# Altium PCB Motherboard.PcbDoc (part 1 of 4)
Units mm, origin at the board's own origin, x right, y up, seen from the top; angles counter-clockwise.
Board outline 133.86 x 61.62 mm, 4 copper layers (Top Layer, Ground Plane, Power Plane, Bottom Layer), stack 1.586 mm thick; 226 components, 149 nets, 791 pads, 852 vias.
Unrouted connection lines stored in the file: 19.
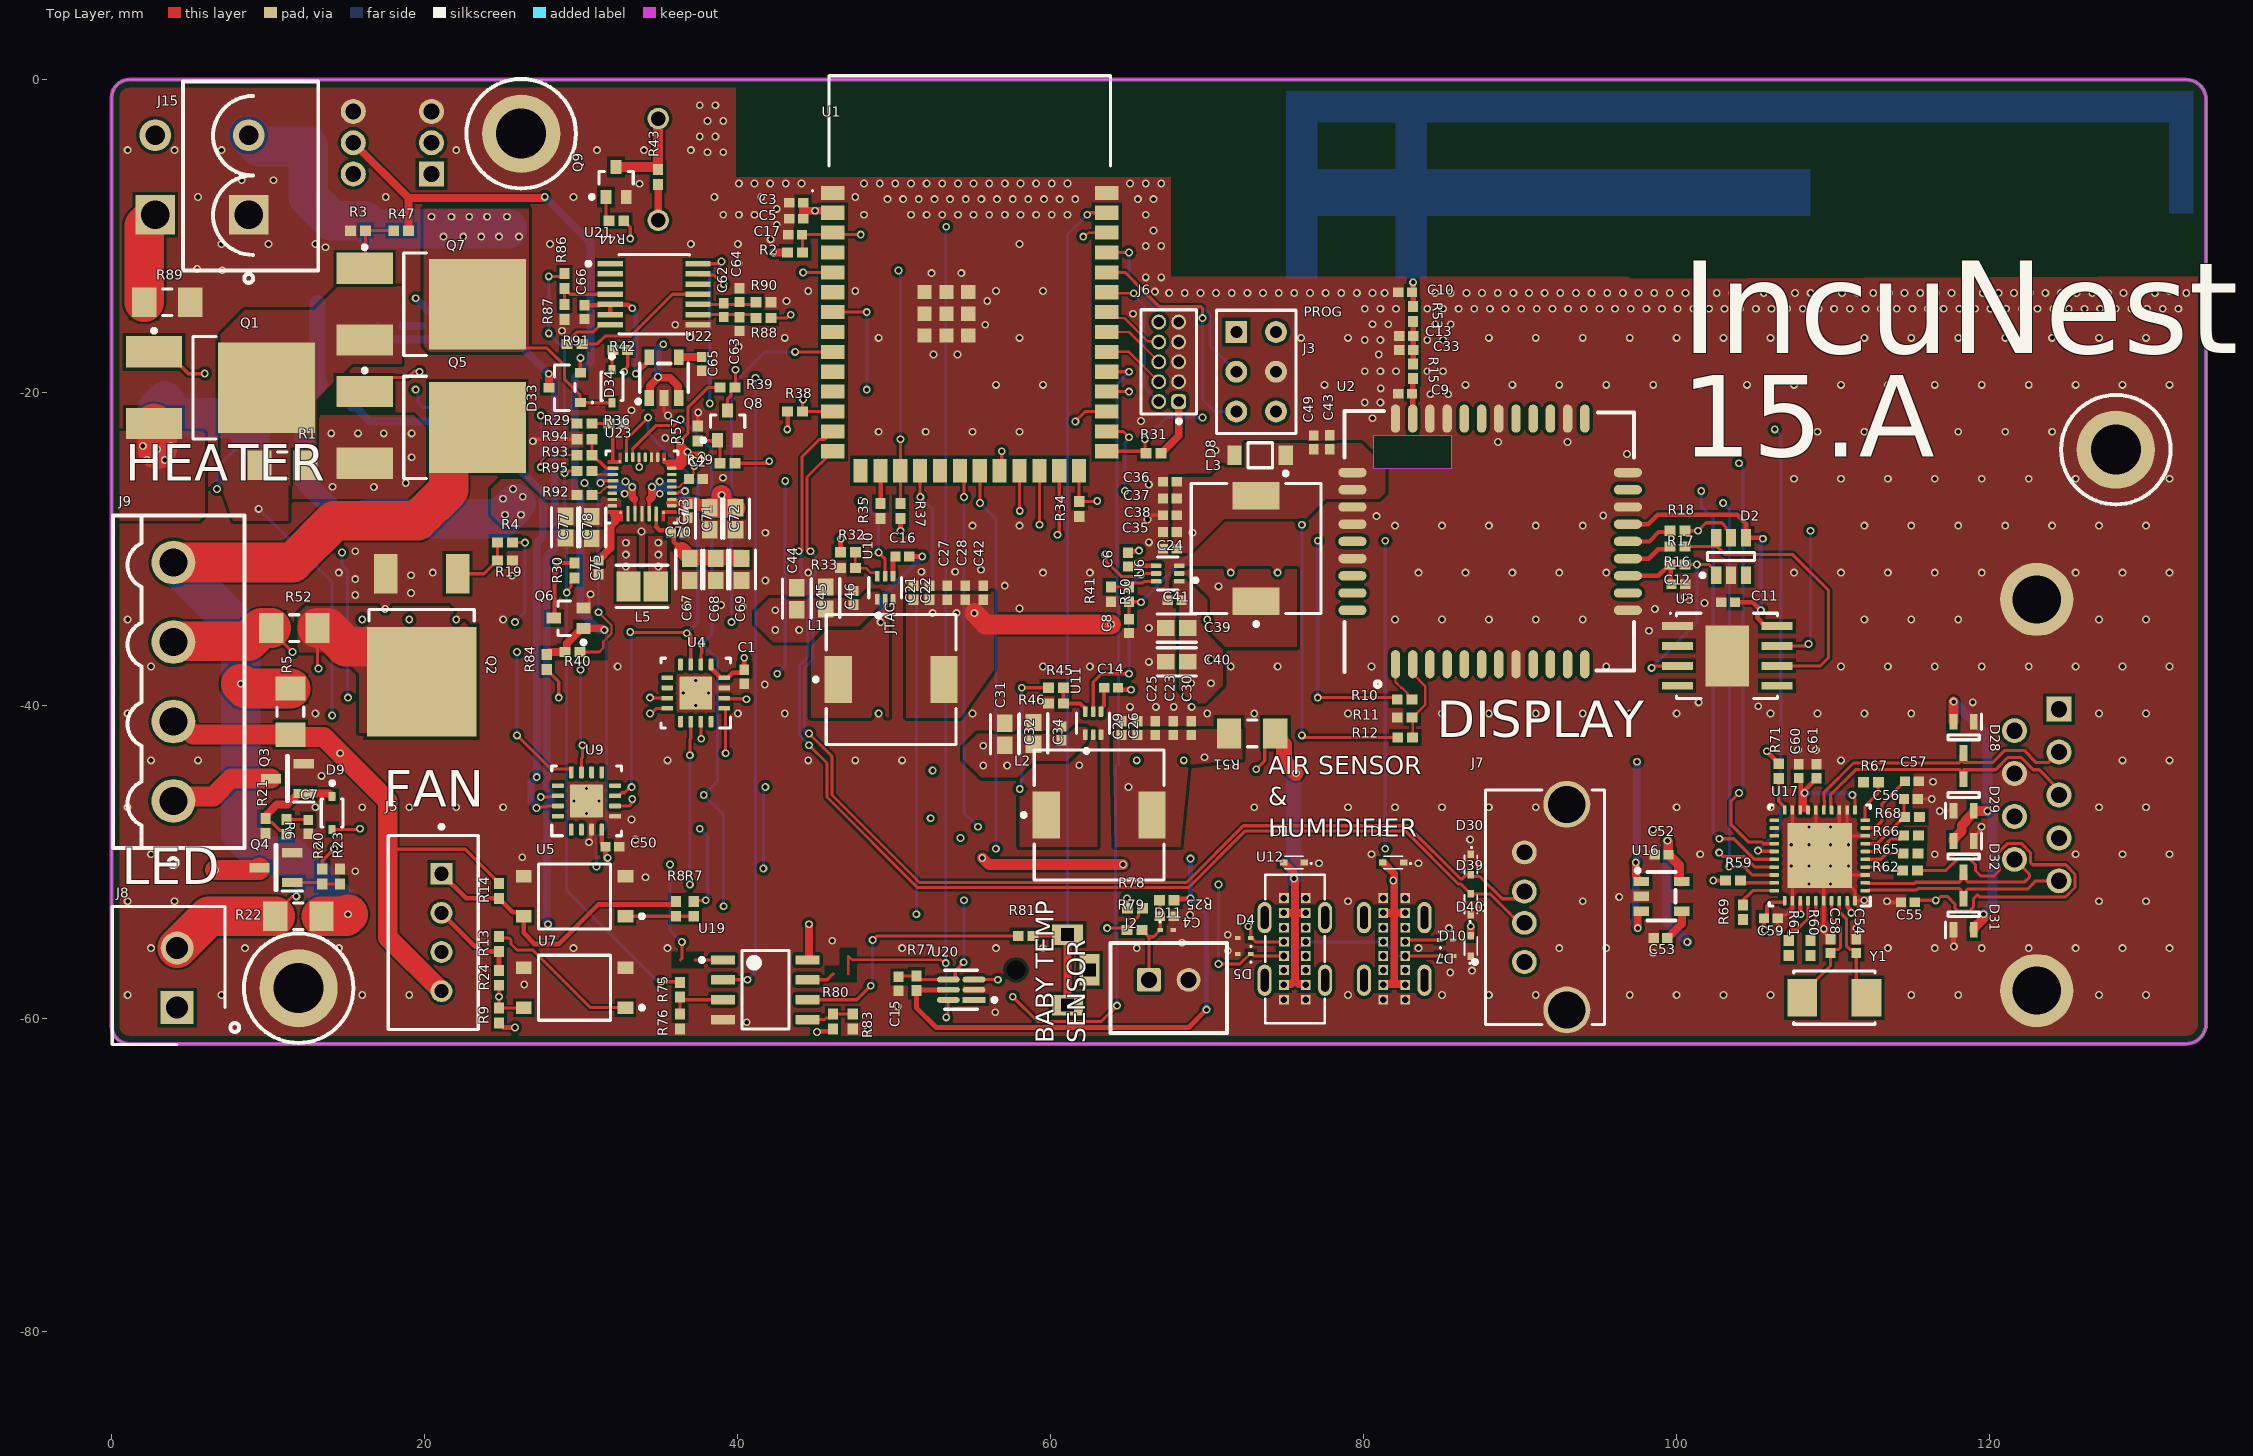
[diagram p0: Top Layer view]
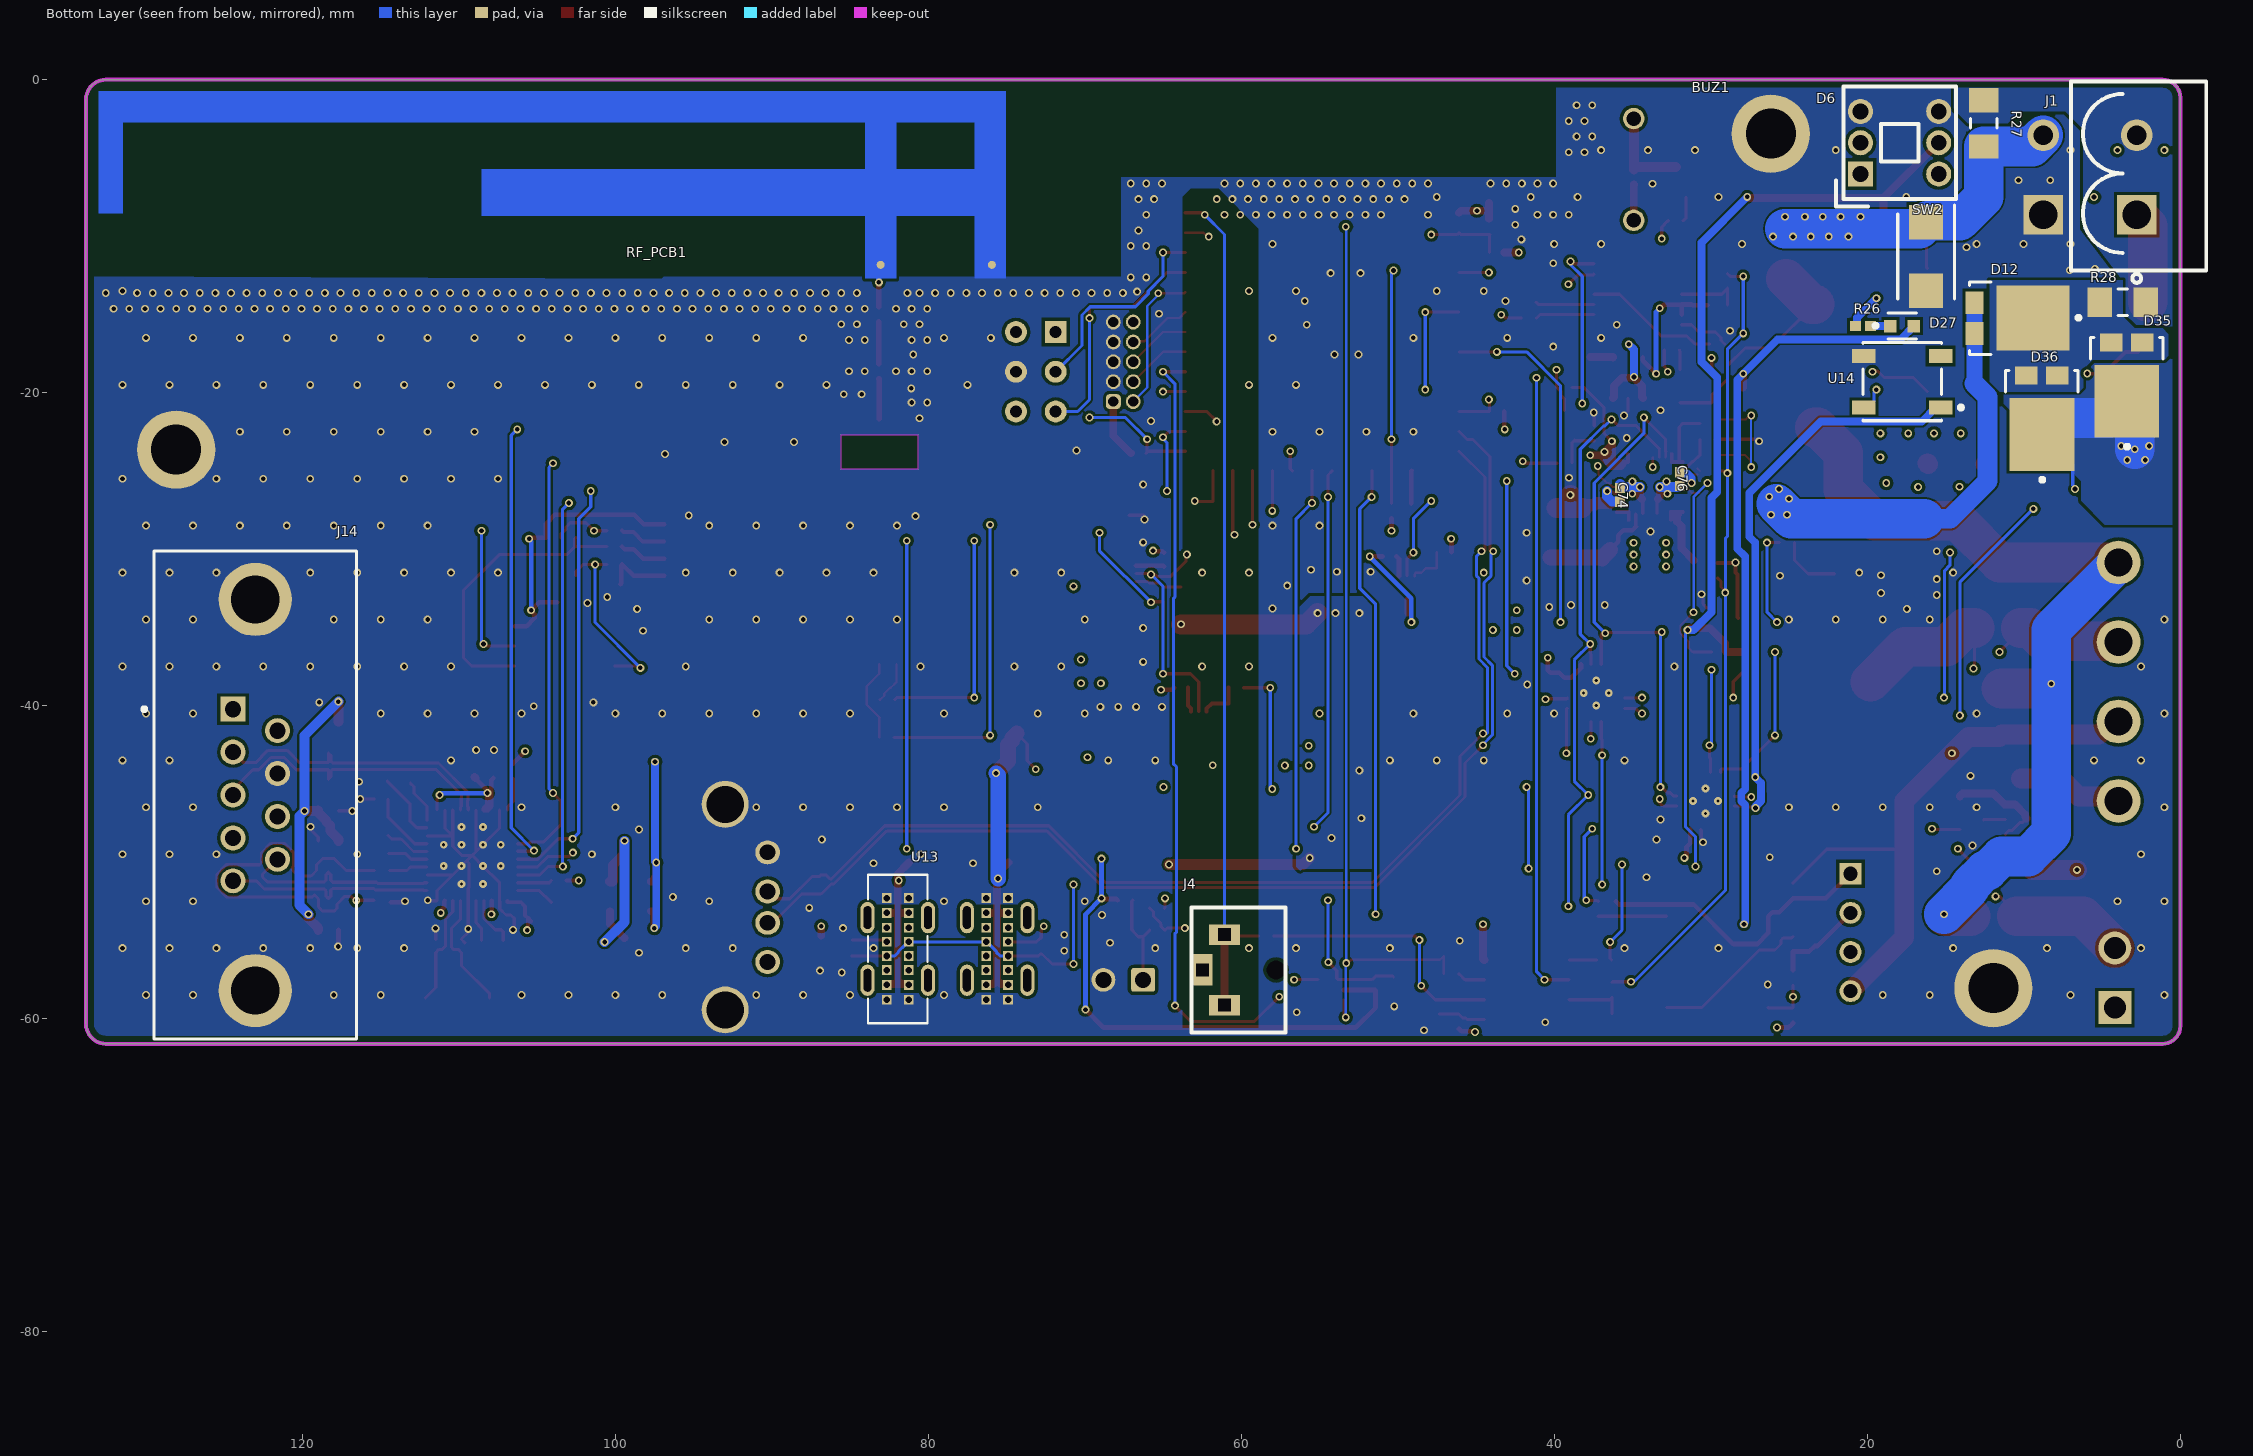
[diagram p1: Bottom Layer view, seen from below]
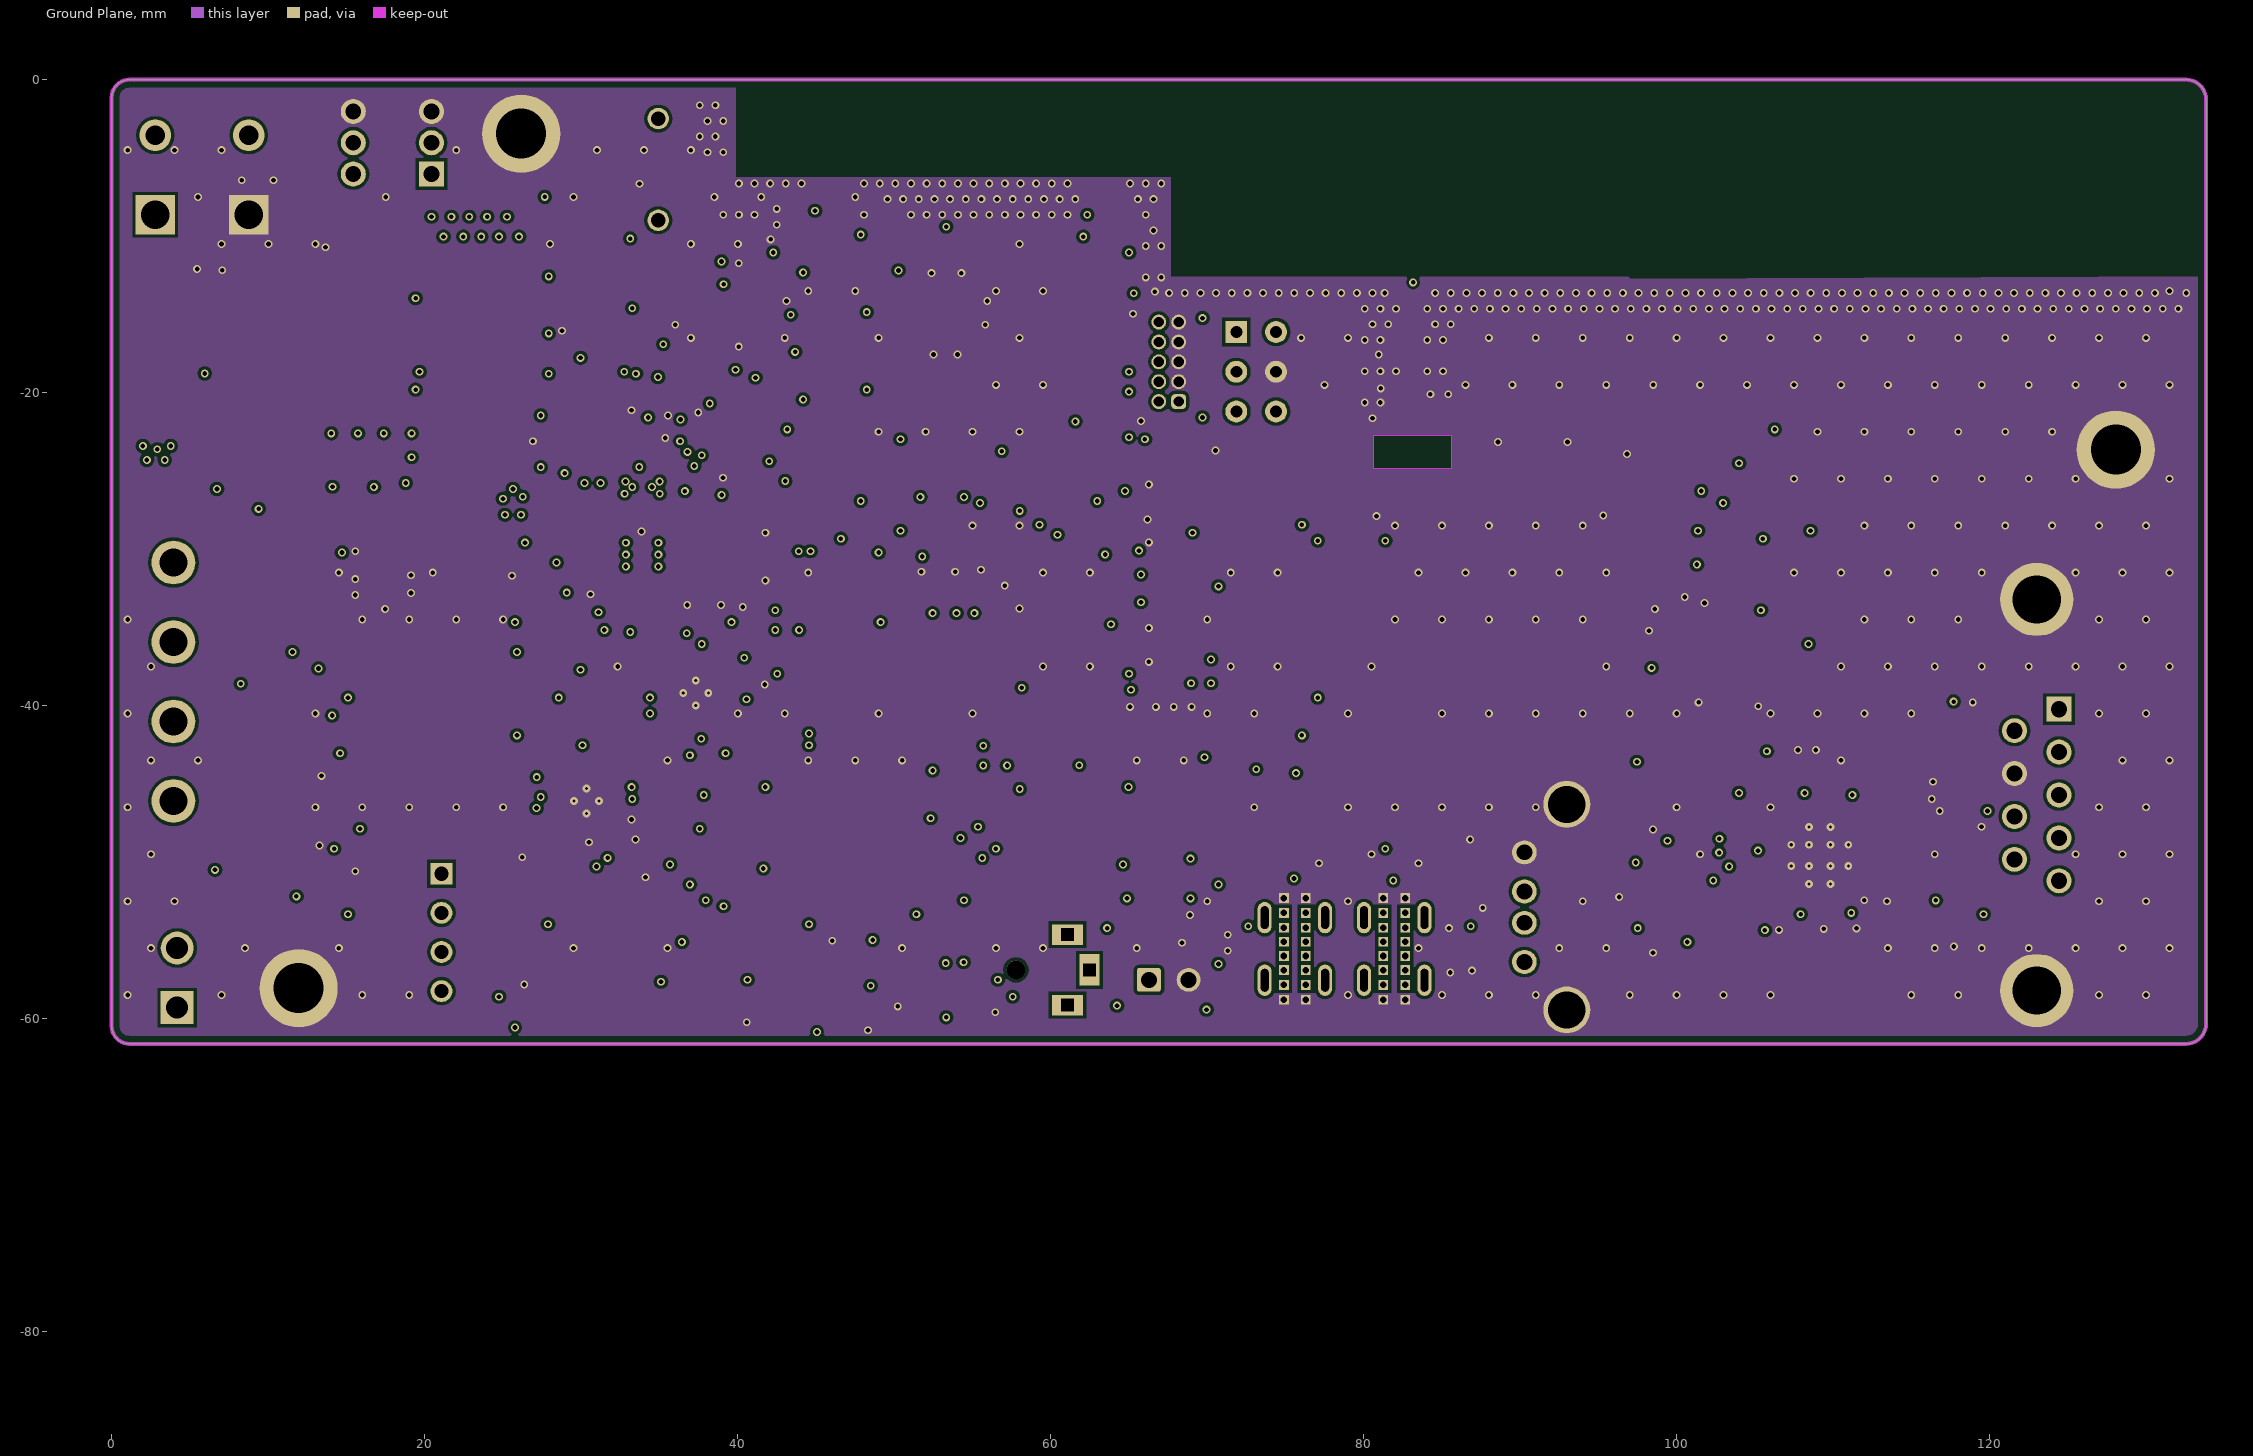
[diagram p2: Ground Plane]
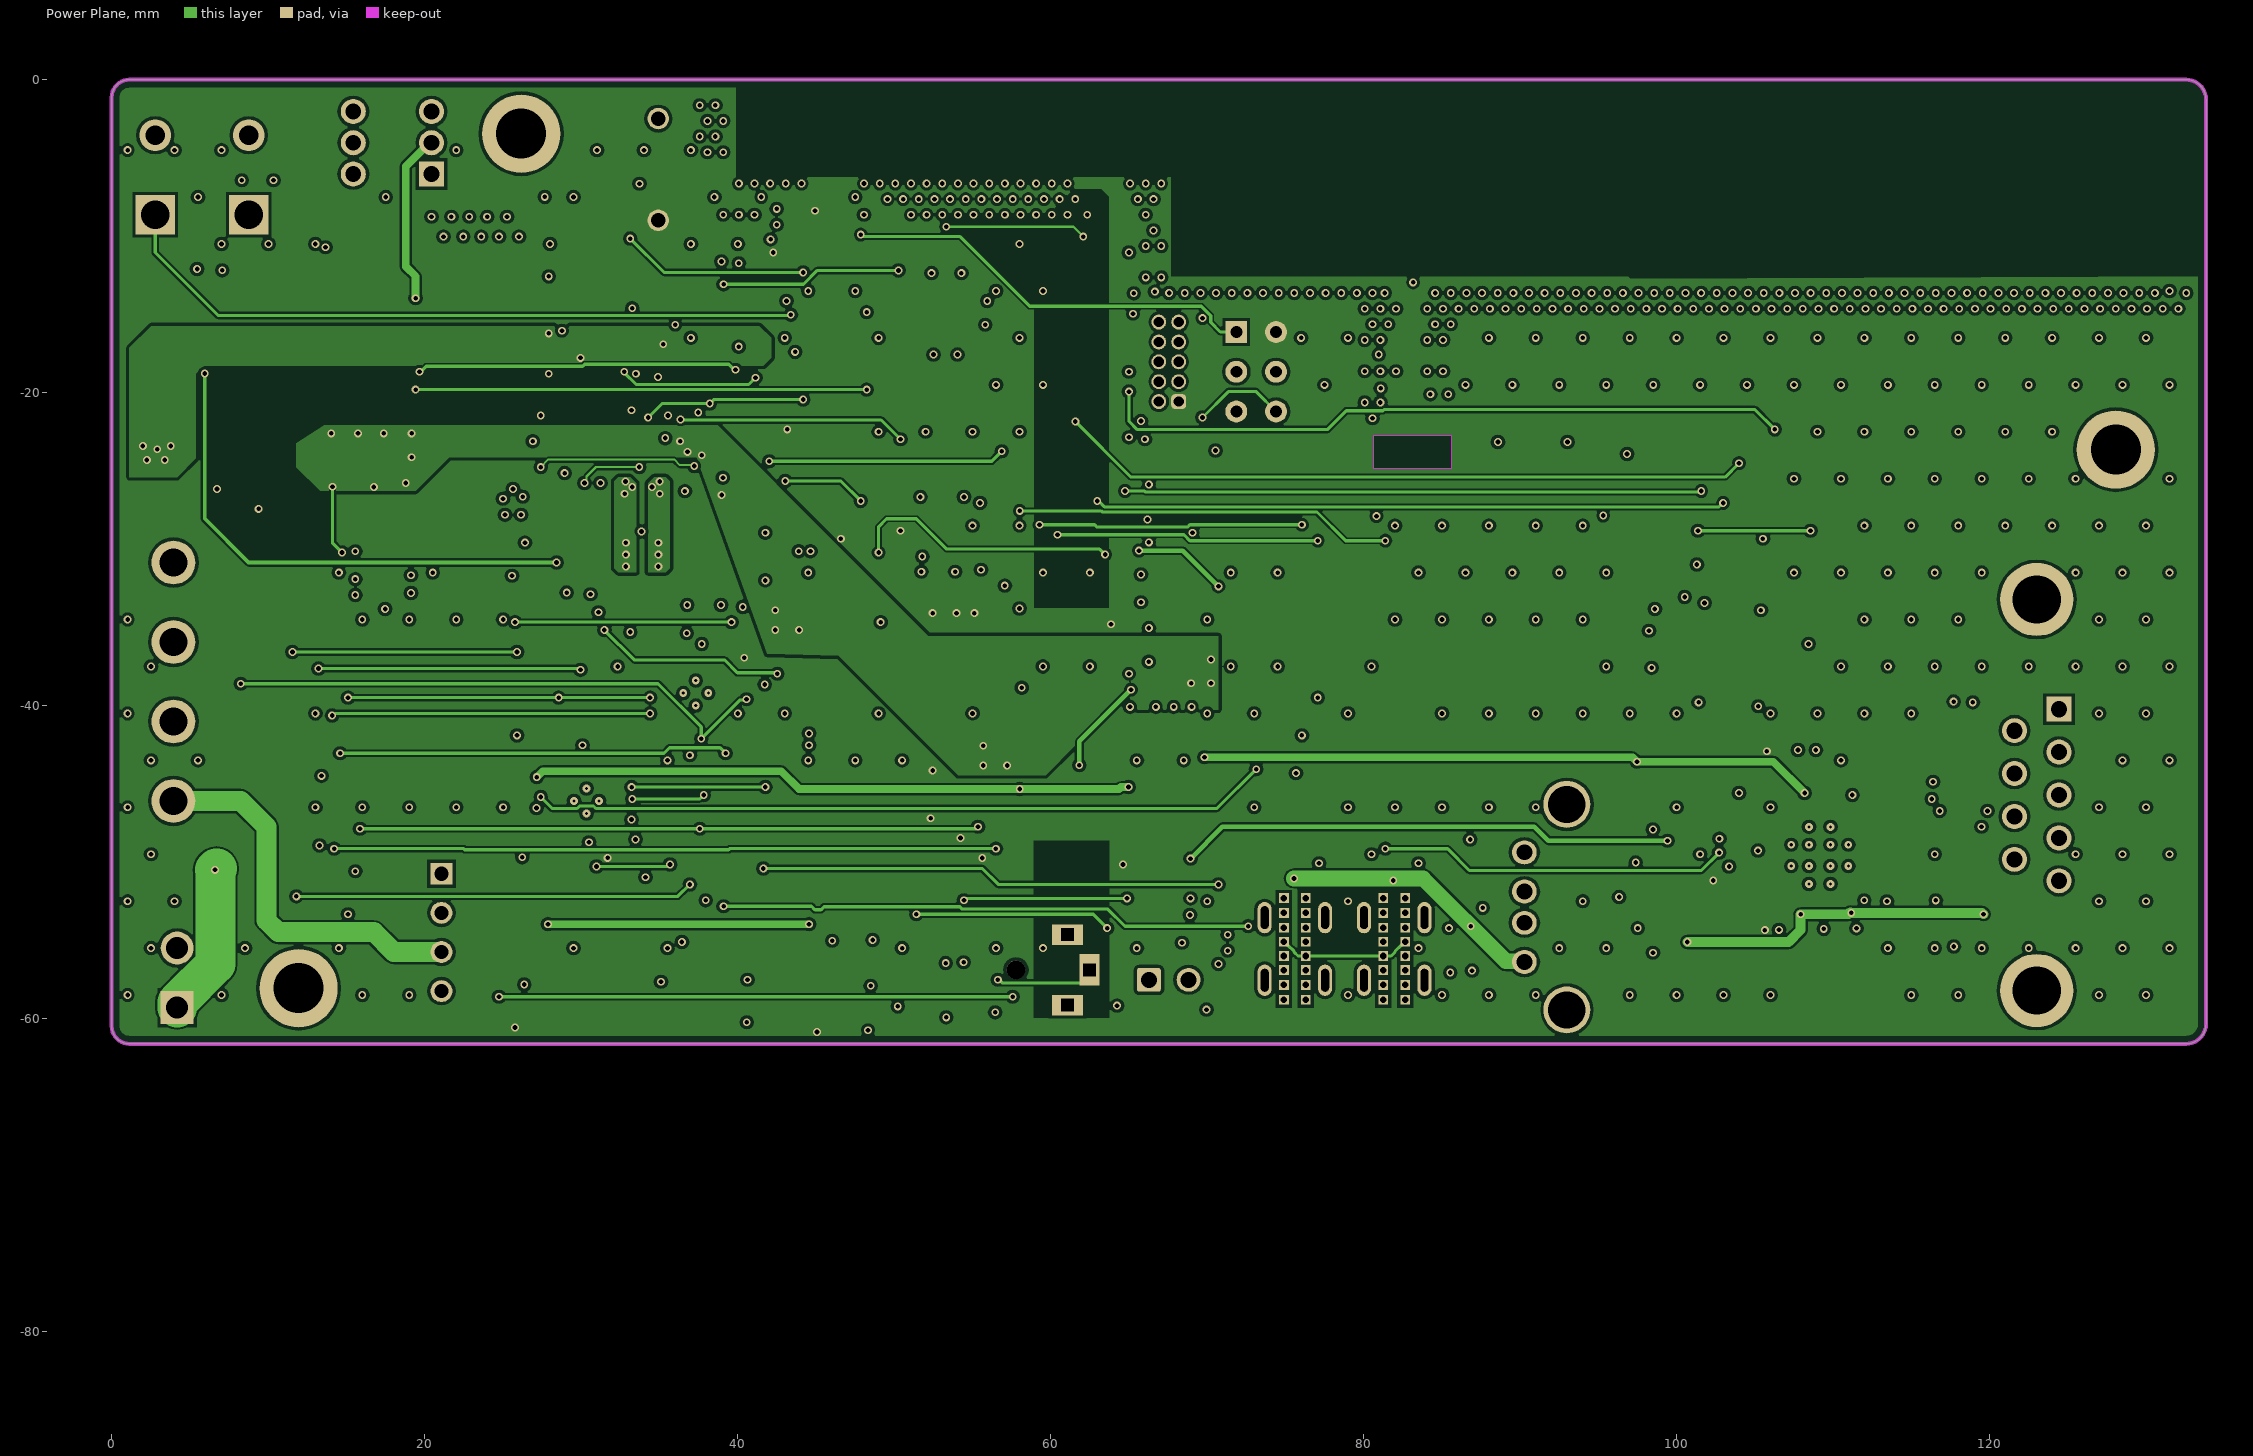
[diagram p3: Power Plane]
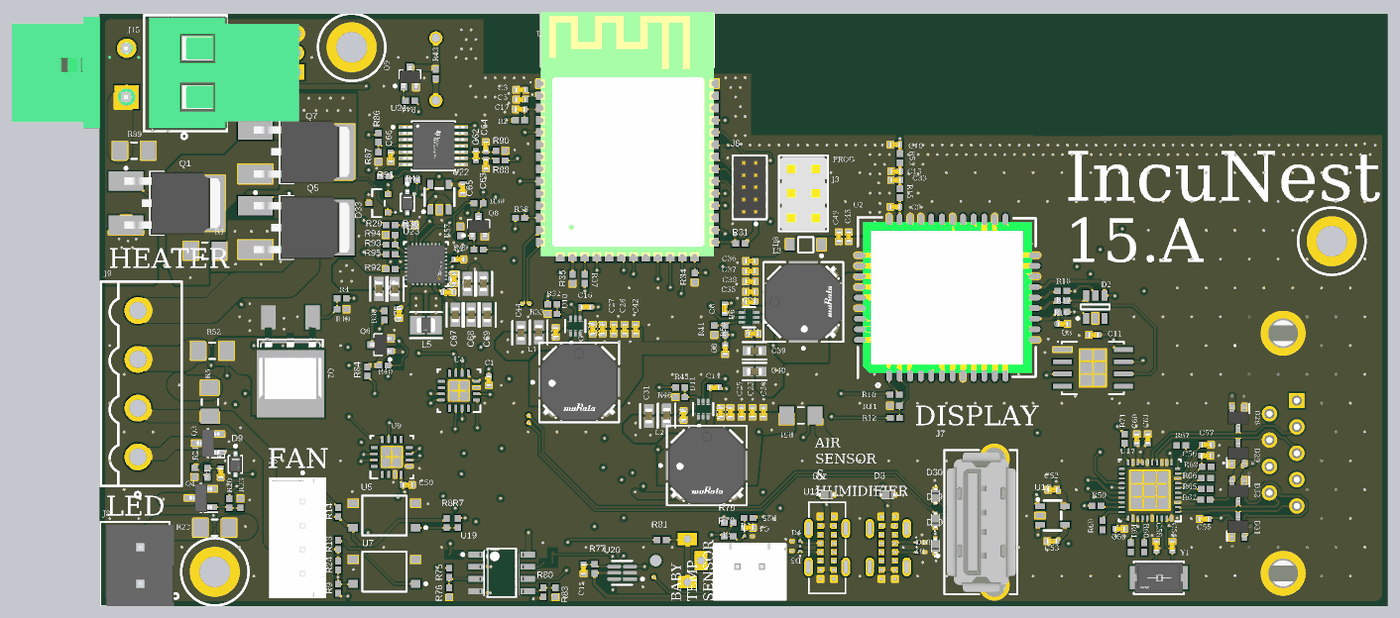
[diagram p6: 3D render of the assembled board from above, using the file's embedded part models]
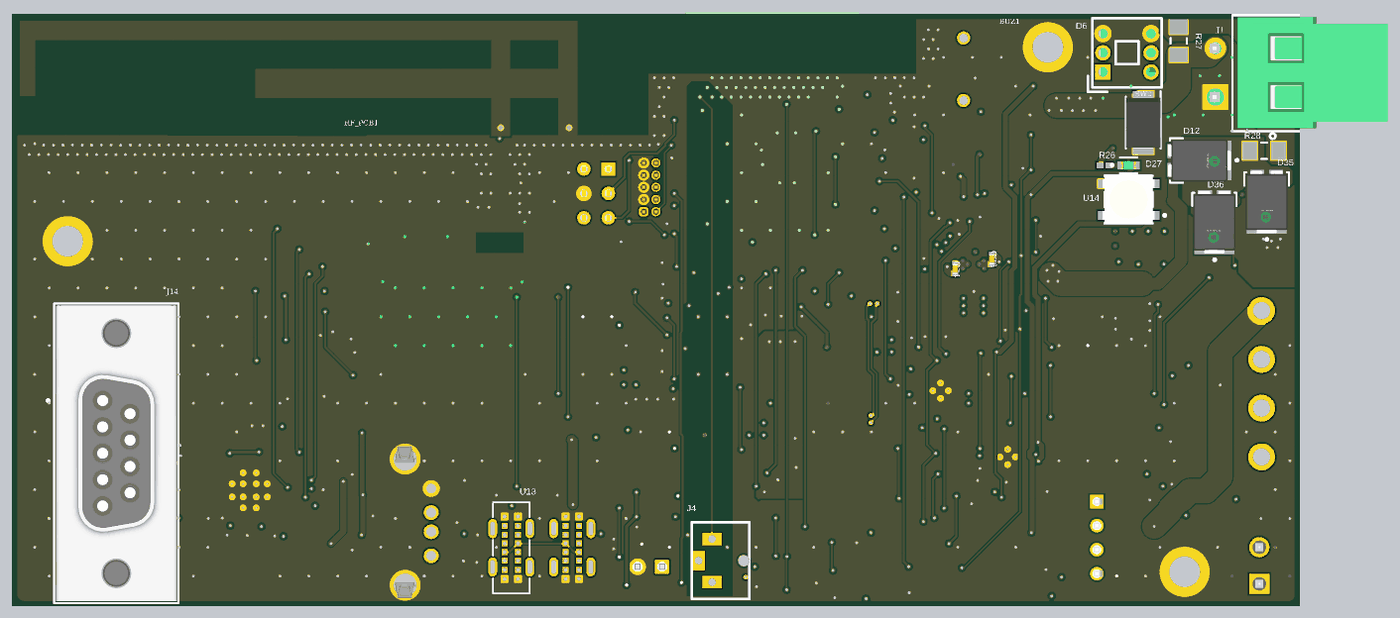
[diagram p7: 3D render of the assembled board from below, using the file's embedded part models]

## Layer stack, top to bottom
Top Solder: solder mask 0.0254, Solder Resist, Dk 3.5
Top Layer: signal copper 0.035
Core1: prepreg 0.2104, FR-4, Dk 3.95
Ground Plane: signal copper 0.0152
Core2: core 1.065, FR-4, Dk 3.95
Power Plane: signal copper 0.0152
Core3: prepreg 0.2104, FR-4, Dk 3.95
Bottom Layer: signal copper 0.035
Bottom Solder: solder mask 0.0254, Solder Resist, Dk 3.5

## Board outline
0,-60.476 0,-1.143 cw(c1.143,-1.143) 1.143,0 132.588,0 cw(c132.588,-1.27) 133.858,-1.27 133.858,-60.349 cw(c132.588,-60.349) 132.588,-61.619 1.143,-61.619 cw(c1.143,-60.476)

## Design rules (kind name [scope] priority, off if disabled: settings)
AssemblyTestPointUsage AssemblyTestPointUsage_1 [All] p2:
AssemblyTestpoint AssemblyTestpoint_1 [All] p2: testpointundercomponent=TRUE minsize=1.016 maxsize=2.54 preferedsize=1.524 minholesize=0 maxholesize=1.016 preferedholesize=0.813 testpointgrid=0.025 usegrid=TRUE gridtolerance=0 allowsidetop=TRUE allowsidebottom=TRUE
Clearance "Board outline clearance" [All vs OnLayer('Keep-Out Layer')] p1: gap=0.381 ignorepadtopadclearanceinfootprint=FALSE except(0: Arc-Hole Track-Hole SMDPad-Hole THPad-Hole Via-Hole Fill-Hole Poly-Hole Region-Hole Text-Hole)
Clearance Clearance_1 [All] p2: gap=0.2 ignorepadtopadclearanceinfootprint=FALSE except(0: Arc-Text Track-Text SMDPad-Text THPad-Text Via-Text Fill-Text Poly-Text Region-Text Text-Text Text-Hole; 0.127: Arc-Arc Arc-Track Arc-THPad Arc-Via Arc-Fill Arc-Poly Arc-Region Arc-Hole Track-Track Track-THPad Track-Via Track-Fill Track-Poly Track-Region Track-Hole SMDPad-SMDPad; 0.254: Via-Via)
ComponentClearance [InComponent('L1')] p1: gap=0 collisioncheckmode=3 verticalgap=0.254 showdistances=FALSE
ComponentClearance UFL [InComponent('RF_CON1')] p2: gap=0 collisioncheckmode=3 verticalgap=0.254 showdistances=FALSE
ComponentClearance ComponentClearance_1 [All] p3: gap=0.254 collisioncheckmode=3 verticalgap=0.254 showdistances=FALSE
DiffPairsRouting DiffPair_USBDiffPairsRouting [InDifferentialPairClass('USB')] p1: maxlimit=0.127 minlimit=0.127 mostfreqgap=0.127 toplayer_minwidth=0.194 toplayer_maxwidth=0.194 toplayer_prefwidth=0.194 midlayer1_minwidth=0.159 midlayer1_maxwidth=0.159 midlayer1_prefwidth=0.159 midlayer2_minwidth=0.159 midlayer2_maxwidth=0.159 midlayer2_prefwidth=0.159 bottomlayer_minwidth=0.194 bottomlayer_maxwidth=0.194 bottomlayer_prefwidth=0.194 impedanceprofiledriven=TRUE impedanceprofileid={170D84A8-33D3-444B-B09E-1C0FCCCC4F91} impedanceprofilevalue=90.000000 maxuncoupledlength=12.7
FabricationTestPointUsage FabricationTestPointUsage_1 [All] p2: valid=0 allowmultiple=FALSE
FabricationTestpoint FabricationTestpoint_1 [All] p2: side=3 testpointundercomponent=TRUE minsize=1.016 maxsize=2.54 preferedsize=1.524 minholesize=0 maxholesize=1.016 preferedholesize=0.813 testpointgrid=0.025 allowsidetop=TRUE allowsidebottom=TRUE usegrid=TRUE gridtolerance=0
FanoutControl Fanout_LCC [IsLCC] p1: bgadir=Out bgaviamode=Centered fanoutstyle=Auto fanoutdirection=Alternating viagrid=0.025 // Fanout_LCC (Default Rule)
FanoutControl Fanout_BGA [IsBGA] p2: bgadir=Out bgaviamode=Centered fanoutstyle=Auto fanoutdirection=Alternating viagrid=0.025 // Fanout_BGA (Default Rule)
FanoutControl Fanout_Small [(CompPinCount < 5)] p3: bgadir=Out bgaviamode=Centered fanoutstyle=Auto fanoutdirection=OutThenIn viagrid=0.025 // Fanout_Small (Default Rule)
FanoutControl Fanout_SOIC [IsSOIC] p4: bgadir=Out bgaviamode=Centered fanoutstyle=Auto fanoutdirection=Alternating viagrid=0.025 // Fanout_SOIC (Default Rule)
FanoutControl Fanout_BGA_1 [IsBGA] p6: bgadir=Out bgaviamode=Centered fanoutstyle=Auto fanoutdirection=Alternating viagrid=0.025 // Fanout_BGA (Default Rule)
FanoutControl Fanout_LCC_1 [IsLCC] p7: bgadir=Out bgaviamode=Centered fanoutstyle=Auto fanoutdirection=Alternating viagrid=0.025 // Fanout_LCC (Default Rule)
FanoutControl Fanout_SOIC_1 [IsSOIC] p8: bgadir=Out bgaviamode=Centered fanoutstyle=Auto fanoutdirection=Alternating viagrid=0.025 // Fanout_SOIC (Default Rule)
FanoutControl Fanout_Small_1 [(CompPinCount < 5)] p9: bgadir=Out bgaviamode=Centered fanoutstyle=Auto fanoutdirection=OutThenIn viagrid=0.025 // Fanout_Small (Default Rule)
FanoutControl Fanout_Default_1 [All] p10: bgadir=Out bgaviamode=Centered fanoutstyle=Auto fanoutdirection=Alternating viagrid=0.025 // Fanout_Default (Default Rule)
Height Height_1 [All] p1: minheight=0 maxheight=50 prefheight=12.7
HoleSize HoleSize_1 [All] p1: absolutevalues=TRUE maxlimit=15 minlimit=0.2 maxpercent=80.000 minpercent=20.000
HoleToHoleClearance u8 [All vs InComponent('u8_1')] p1: gap=0 allowstackedmicrovias=TRUE
HoleToHoleClearance [All] p2: gap=0.254 allowstackedmicrovias=TRUE
LayerPairs LayerPairs_1 [All] p1: enforce=TRUE
MatchedLengths DiffPair_USBMatchedLengths [InDifferentialPairClass('USB')] p1: tolerance=25.4 checknetsindiffpair=FALSE checkdiffpairvsdiffpair=TRUE checkxsignals=TRUE checkothers=TRUE
MinimumAnnularRing [All] p1: minimumring=0.09
MinimumSolderMaskSliver MinimumSolderMaskSliver_1 [All] p1 off: minsoldermaskwidth=0.2
NetAntennae NetAntennae_1 [All] p2: netantennaetolerance=0
PasteMaskExpansion PasteMaskExpansion_1 [All] p2: expansion=0
PlaneClearance PlaneClearance_1 [All] p1: clearance=0.508
PlaneConnect PlaneConnect_1 [All] p1: planeconnectstyle=Relief reliefexpansion=0.508 reliefentries=4 reliefconductorwidth=0.7 reliefairgap=0.254
PolygonConnect Power_net [InNet('Vsense+') or InNet('BAT_PROTECTED') or InNet('BAT_P')  or InNet('DC_IN') or InNet('DC_ACTUATORS') or InNet('DC_SYS') or InNet('NetQ2_4') or InNet('NetC74_1') or InNet('NetC76_2') or InNet('3V3_DIG@250MA') or InNet('4V@2A') or InNet('DGND') or InNet('NetJ1_2') or InNet('NetC77_2') or InNet('5V@2A') or InNet('3v3_dig@2A')] p1: connectstyle=Direct reliefconductorwidth=1 reliefentries=4 polygonreliefangle="90 Angle" airgapwidth=0.25
PolygonConnect Power [HasFootprint('DPAK IPD90P03P404ATMA1') Or HasFootprint('FP-PG-TO252-3-MFG') Or HasFootprint('FP-DEM8045C-MFG') Or HasFootprint('PCB-h4cyb3wxd4gf7j132tzl-1')] p2: connectstyle=Relief reliefconductorwidth=2.54 reliefentries=4 polygonreliefangle="90 Angle" airgapwidth=0.254
PolygonConnect Via [IsVia] p3: connectstyle=Direct reliefconductorwidth=0.254 reliefentries=4 polygonreliefangle="90 Angle" airgapwidth=0.254
PolygonConnect [All] p4: connectstyle=Relief reliefconductorwidth=0.508 reliefentries=4 polygonreliefangle="90 Angle" airgapwidth=0.254
PolygonConnect Power_netGND_SHUNT [InNet('GND SHUNT')] p5: connectstyle=Relief reliefconductorwidth=1 reliefentries=4 polygonreliefangle="90 Angle" airgapwidth=0.25
RoutingCorners RoutingCorners_1 [All] p2: cornerstyle=45-Degree minsetback=2.54 maxsetback=2.54
RoutingLayers RoutingLayers_1 [All] p2: top layer_v5=TRUE mid layer 1_v5=TRUE mid layer 2_v5=TRUE bottom layer_v5=TRUE
RoutingPriority RoutingPriority_1 [All] p2: routingpriority=0
RoutingTopology RoutingTopology_1 [All] p2: topology=Shortest
RoutingVias RoutingVias_1 [All] p1: holewidth=0.3 width=0.5 viastyle="Through Hole" minholewidth=0.2 minwidth=0.4 maxholewidth=0.711 maxwidth=1.27
ShortCircuit ShortCircuit_Antenna [InNet('NetC10_2')] p1: allowed=TRUE
ShortCircuit ShortCircuit_1 [All] p2: allowed=FALSE
SilkToBoardRegionClearance SilkToBoardRegionClearance_1 [InNet('No Net')] p2 off:
SilkToSilkClearance SilkToSilkClearance_1 [All] p1: silktosilkclearance=0
SilkToSolderMaskClearance SilkToSolderMaskClearance_1 [IsPad] p1: minsilkscreentomaskgap=0 clearancetoexposedcopper=TRUE
SolderMaskExpansion [All] p1: expansion=0.102 istentingtop=FALSE
SolderMaskExpansion SolderMaskExpansion_1 [All] p2: expansion=0.102 istentingtop=FALSE
UnRoutedNet UnRoutedNet_1 [All] p1:
UnpouredPolygon UnpouredPolygon_1 [All] p2:
Width Width_GSM_ANTENNA_1 [InNet('NetC10_2') or InNet('NetC13_2') or InNet('NetC10_2')] p1: maxlimit=0.35 minlimit=0.35 preferedwidth=0.35
Width Width_1 [All] p2: maxlimit=8 minlimit=0.1 preferedwidth=0.2
13 further rules are at their usual default settings.

## Classes and differential pairs
differential pair class USB: D
component class U_Battery: C2 C62 C63 C64 C65 C66 C67 C68 C69 C70 C71 C72 C73 C74 C75 C76 C77 C78 D12 D35 D36 J1 L5 R27 R28 R29 R36 R86 R87 R88 R89 R90 R91 R92 R93 R94 R95 U21 U22 U23
component class U_GSM: C8 C9 C10 C11 C12 C13 C33 C43 C49 D2 D8 D22 D23 D24 J11 R10 R11 R12 R15 R16 R17 R18 R53 R63 RF_PCB1 U2 U3
differential pair class AFE: IN TX
net class GPRS_RF: NetC9_2 NetC10_2 NetC13_2
component class U_Power_Input: D6 D13 D14 D15 D22 D27 D33 D34 J10 J11 J15 Q1 Q6 Q7 R1 R3 R26 R30 R40 R42 R47 R63 R74 R75 R76 SW2 U14 U19
component class U_Buzzer: BUZ1 Q9 R43 R44
component class U_AFE: C54 C55 C56 C57 C58 C59 C60 C61 D13 D22 D28 D29 D31 D32 J14 R59 R60 R61 R62 R63 R64 R65 R66 R67 R68 R69 R71 R74 U17 Y1
component class U_Actuators: C7 D1 D3 D4 D5 D7 D9 D10 D20 D21 D30 D39 D40 J5 J7 J8 J9 Q2 Q3 Q4 Q5 Q8 R4 R5 R6 R7 R8 R9 R13 R14 R19 R20 R21 R22 R23 R24 R39 R49 R51 R52 R56 R57 SW1 U5 U7 U12 U13
component class U_sensors: 1 2 3 4 AGND1 C1 C4 C15 C50 D11 DGND1 J2 J4 J10 R25 R58 R77 R78 R79 R80 R81 R83 U4 U9 U18 U20
component class U_power: C6 C14 C16 C21 C22 C23 C24 C25 C26 C27 C28 C29 C30 C31 C32 C34 C35 C36 C37 C38 C39 C40 C41 C42 C44 C45 C46 C52 C53 L1 L2 L3 R32 R33 R41 R45 R46 R50 R84 U6 U10 U11 U16
component class U_uC: C3 C5 C17 J3 J6 R2 R31 R34 R35 R37 R38 R56 U1
differential pair D: +D_P -D_N
differential pair TX: +TX_P -TX_N
differential pair IN: +IN_P -IN_N

## Components (designator, comment, footprint, x,y, rotation, side; value= is the part's Value field where it differs from the comment)
BUZ1 "CUI CMT-1285C-035" BUZZER-12MM-NS 34.94,-5.739 r270 bottom
C1 "100nF 0402 X7R 50V" CAPC1005X55X25NL5T10 40.437,-38.164 r90 top
C2 "10uF 0402 X5R 10V" CAPC1005X55X25NL5T10 37.338,-25.527 r180 top
C3 "10uF 0402 X5R 10V" CAPC1005X55X25NL5T10 43.756,-7.874 r0 top
C4 "1uF 0402 X5R 25V" CAPC1005X55X25NL5T10 67.437,-53.467 r180 top
C5 "100nF 0402 X7R 50V" CAPC1005X55X25NL5T10 43.756,-8.89 r0 top
C6 "100nF 0402 X7R 50V" CAPC1005X55X25NL5T10 64.956,-30.677 r270 top
C7 "1uF 0402 X5R 25V" CAPC1005X55X25NL5T10 12.573,-47.752 r90 top
C8 "100nF 0402 X7R 50V" CAPC1005X55X25NL5T10 65.024,-34.925 r90 top
C9 "100nF 0402 X7R 50V" CAPC1005X55X25NL5T10 82.677,-20.066 r0 top
C10 "100nF 0402 X7R 50V" CAPC1005X55X25NL5T10 82.677,-13.589 r0 top
C11 "100nF 0402 X7R 50V" CAPC1005X55X25NL5T10 103.319,-33.401 r0 top
C12 "18pF 0402 X5R 50V" CAPC1005X55X25NL5T10 100.135,-32.258 r180 top
C13 "100nF 0402 X7R 50V" CAPC1005X55X25NL5T10 82.745,-16.383 r0 top
C14 "100nF 0402 X7R 50V" CAPC1005X55X25NL5T10 63.881,-38.862 r180 top
C15 "1uF 0402 X5R 25V" CAPC1005X55X25NL5T10 50.292,-57.785 r90 top
C16 "100nF 0402 X7R 50V" CAPC1005X55X25NL5T10 50.546,-30.48 r180 top
C17 "1uF 0402 X5R 25V" CAPC1005X55X25NL5T10 43.688,-9.906 r0 top
C21 "10uF 0402 X5R 10V" CAPC1005X55X25NL5T10 51.257,-32.791 r270 top
C22 "10uF 0402 X5R 10V" CAPC1005X55X25NL5T10 52.273,-32.791 r270 top
C23 "10uF 0402 X5R 10V" CAPC1005X55X25NL5T10 67.851,-41.448 r270 top
C24 "10uF 0402 X5R 10V" CAPC1005X55X25NL5T10 67.632,-29.972 r0 top
C25 "10uF 0402 X5R 10V" CAPC1005X55X25NL5T10 66.708,-41.448 r270 top
C26 "10uF 0402 X5R 10V" CAPC1005X55X25NL5T10 65.565,-41.448 r270 top
C27 "10uF 0402 X5R 10V" CAPC1005X55X25NL5T10 53.416,-32.791 r270 top
C28 "10uF 0402 X5R 10V" CAPC1005X55X25NL5T10 54.559,-32.791 r270 top
C29 "10uF 0402 X5R 10V" CAPC1005X55X25NL5T10 64.549,-41.448 r270 top
C30 "100nF 0402 X7R 50V" CAPC1005X55X25NL5T10 68.994,-41.448 r270 top
C31 "10uF 0603 X5R 25V" FP-GRM188-0_2-IPC_B 57.079,-41.831 r270 top
C32 "10uF 0603 X5R 25V" FP-GRM188-0_2-IPC_B 58.928,-41.783 r270 top
C33 "100nF 0402 X7R 50V" CAPC1005X55X25NL5T10 82.745,-17.272 r0 top
C34 "100nF 0402 X7R 50V" CAPC1005X55X25NL5T10 60.706,-41.783 r270 top
C35 "10uF 0402 X5R 10V" CAPC1005X55X25NL5T10 67.632,-28.905 r0 top
C36 "10uF 0402 X5R 10V" CAPC1005X55X25NL5T10 67.632,-25.705 r0 top
C37 "10uF 0402 X5R 10V" CAPC1005X55X25NL5T10 67.632,-26.772 r0 top
C38 "100nF 0402 X7R 50V" CAPC1005X55X25NL5T10 67.632,-27.839 r0 top
C39 "10uF 0603 X5R 25V" FP-GRM188-0_2-IPC_B 68.072,-35.052 r0 top
C40 "10uF 0603 X5R 25V" FP-GRM188-0_2-IPC_B 68.072,-37.211 r0 top
C41 "100nF 0402 X7R 50V" CAPC1005X55X25NL5T10 67.945,-33.274 r0 top
C42 "100nF 0402 X7R 50V" CAPC1005X55X25NL5T10 55.702,-32.791 r270 top
C43 "18pF 0402 X5R 50V" CAPC1005X55X25NL5T10 77.851,-23.173 r270 top
C44 "10uF 0603 X5R 25V" FP-GRM188-0_2-IPC_B 43.786,-33.174 r270 top
C45 "10uF 0603 X5R 25V" FP-GRM188-0_2-IPC_B 45.636,-33.126 r270 top
C46 "100nF 0402 X7R 50V" CAPC1005X55X25NL5T10 47.414,-33.126 r270 top
C49 "10uF 0402 X5R 10V" CAPC1005X55X25NL5T10 76.835,-23.182 r270 top
C50 "100nF 0402 X7R 50V" CAPC1005X55X25NL5T10 32.004,-49.022 r180 top
C52 "1uF 0402 X5R 25V" CAPC1005X55X25NL5T10 99.06,-49.53 r0 top
C53 "1uF 0402 X5R 25V" CAPC1005X55X25NL5T10 98.992,-54.864 r0 top
C54 "18pF 0402 X5R 50V" CAPC1005X55X25NL5T10 111.509,-55.375 r270 top
C55 "10nF 0402 X7R 50V" CAPC1005X55X25NL5T10 114.808,-52.578 r0 top
C56 "2.2uF 0402 X5R 25V" CAPC1005X55X25NL5T10 114.997,-45.977 r180 top
C57 "2.2uF 0402 X5R 25V" CAPC1005X55X25NL5T10 115.065,-44.834 r180 top
C58 "18pF 0402 X5R 50V" CAPC1005X55X25NL5T10 109.858,-55.375 r270 top
C59 "100nF 0402 X7R 50V" CAPC1005X55X25NL5T10 106.045,-53.594 r180 top
C60 "100nF 0402 X7R 50V" CAPC1005X55X25NL5T10 107.823,-44.196 r270 top
C61 "1uF 0402 X5R 25V" CAPC1005X55X25NL5T10 108.969,-44.199 r270 top
C62 "100nF 0402 X7R 50V" CAPC1005X55X25NL5T10 39.116,-14.732 r270 top
C63 "100nF 0402 X7R 50V" CAPC1005X55X25NL5T10 40.132,-15.621 r90 top
C64 "100nF 0402 X7R 50V" CAPC1005X55X25NL5T10 40.132,-13.775 r270 top
C65 "1uF 0402 X5R 25V" CAPC1005X55X25NL5T10 37.719,-18.161 r90 top
C66 "1uF 0402 X5R 25V" CAPC1005X55X25NL5T10 30.226,-14.859 r90 top
C67 "10uF 0603 X5R 25V" FP-GRM188-0_2-IPC_B 36.957,-31.303 r90 top
C68 "10uF 0603 X5R 25V" FP-GRM188-0_2-IPC_B 38.608,-31.303 r90 top
C69 "10uF 0603 X5R 25V" FP-GRM188-0_2-IPC_B 40.259,-31.303 r90 top
C70 "100nF 0402 X7R 50V" CAPC1005X55X25NL5T10 36.195,-28.956 r180 top
C71 "10uF 0603 X5R 25V" FP-GRM188-0_2-IPC_B 38.227,-28.067 r90 top
C72 "10uF 0603 X5R 25V" FP-GRM188-0_2-IPC_B 39.878,-28.067 r90 top
C73 "100nF 0402 X7R 50V" CAPC1005X55X25NL5T10 36.83,-27.559 r90 top
C74 "47nF 0402 X7R 50V" CAPC1005X55X25NL5T10 35.814,-26.543 r270 bottom
C75 "1nF 0402 X7R 50V" CAPC1005X55X25NL5T10 31.115,-31.174 r90 top
C76 "47nF 0402 X7R 50V" CAPC1005X55X25NL5T10 32.004,-25.527 r270 bottom
C77 "10uF 0603 X5R 25V" FP-GRM188-0_2-IPC_B 29.015,-28.598 r90 top
C78 "10uF 0603 X5R 25V" FP-GRM188-0_2-IPC_B 30.681,-28.622 r90 top
D1 "LESD5D5.0CT1G" LESD5D50CT1G 75.565,-50.038 r180 top
D2 "ESDA6V1-5SC6" MF06A_N 103.505,-30.48 r90 top
D3 "LESD5D5.0CT1G" LESD5D50CT1G 81.915,-50.038 r180 top
D4 "ESD9B3.3ST5G" ONSC-SOD-923-2-514AB-01_V 72.39,-54.864 r180 top
D5 "ESD9B3.3ST5G" ONSC-SOD-923-2-514AB-01_V 72.39,-55.88 r180 top
D6 "SMBJ13A" DIOM5436X244N 16.256,-11.303 r270 bottom
D7 "ESD9B3.3ST5G" ONSC-SOD-923-2-514AB-01_V 85.305,-54.991 r0 top
D8 "MMSZ5231BT1G" ONSC-SOD-123-2-425-04_V 73.406,-24.003 r180 top
D9 "1N5711WS-7-F" FP-SOD323-MFG 14.097,-46.863 r270 top value=2pF
D10 "ESD9B3.3ST5G" ONSC-SOD-923-2-514AB-01_V 85.344,-56.007 r0 top
D11 "ESD9B3.3ST5G" ONSC-SOD-923-2-514AB-01_V 67.437,-54.356 r0 top
D12 "FSV1550V" FP-340BQ-MFG 10.414,-15.24 r0 bottom
D27 "VLMB1300-GS08" FP-6_541-5094_01-4-MFG 17.78,-15.748 r180 bottom
D28 "BAV99W-7-F" SOT65P210X110-3N 118.364,-42.037 r270 top
D29 "BAV99W-7-F" SOT65P210X110-3N 118.364,-45.72 r90 top
D30 "LESD5D5.0CT1G" LESD5D50CT1G 86.868,-50.165 r270 top
D31 "BAV99W-7-F" SOT65P210X110-3N 118.364,-53.34 r90 top
D32 "BAV99W-7-F" SOT65P210X110-3N 118.364,-49.657 r270 top
D33 "BAT54C" NXP-SOT23-3_V 28.956,-19.685 r270 top
D34 "1N5711WS-7-F" FP-SOD323-MFG 31.975,-19.597 r270 top value=2pF
D35 "FSV1550V" FP-340BQ-MFG 3.429,-19.558 r90 bottom
D36 "FSV1550V" FP-340BQ-MFG 8.859,-21.673 r90 bottom
D39 "LESD5D5.0CT1G" LESD5D50CT1G 86.868,-52.705 r90 top
D40 "LESD5D5.0CT1G" LESD5D50CT1G 86.868,-55.372 r90 top
J1 "Degson 2EDGK-5.08-02P-14-00AH" PCB-h4cyb3wxd4gf7j132tzl-1 2.794,-6.096 r90 bottom
J2 "JST B2B-XH-A" PCB-pp1at3pfx7vls1ur72ey-1 66.294,-57.531 r0 top
J3 "Samtec SLW-103-01-T-D" PCB-37z8hw1ej4f71bosen9e-1 71.882,-16.129 r0 top
J4 "PJ-3059-B" PJ-3059-B 60.198,-56.896 r180 bottom
J5 "B4B-XH-A(LF)(SN)" FP-B4B-XH-A_LF_SN-MFG 20.557,-54.503 r90 top
J6 "62201021121" 62201021121 67.564,-18.034 r90 top
J7 "TE Connectivity 1734366-3" PCB-wbedblczgi94a8su0lrn-1 91.652,-52.888 r90 top
J8 "WJ15EDGVC-3.81-2P" SHDR2W85P0X381_1X2_850X700X935P 4.191,-59.309 r90 top
J9 "KF2EDGVC-5.08-4P" CONN-TH_4P-P5.08_KF2EDGVC-5.08-4P 3.952,-38.481 r90 top
J14 "2-5747706-0" FP-2-5747706-0-MFG 123.038,-45.72 r90 bottom
J15 "Degson 2EDGK-5.08-02P-14-00AH" PCB-h4cyb3wxd4gf7j132tzl-1 8.763,-6.096 r90 top
L1 "1217AS-H-3R3N=P3" FP-DEM8045C-MFG 49.827,-38.333 r0 top
L2 "1217AS-H-3R3N=P3" FP-DEM8045C-MFG 63.119,-46.99 r0 top
L3 "1217AS-H-3R3N=P3" FP-DEM8045C-MFG 73.152,-29.972 r90 top
L5 "DFE201612E-1R0M=P2" FP-DFE201612C-IPC_A 33.909,-32.385 r0 top
Q1 "IPD90P03P404ATMA1" "DPAK IPD90P03P404ATMA1" 7.112,-19.685 r0 top
Q2 "IRLR7843TRPBF" FP-PG-TO252-3-MFG 19.812,-36.156 r180 top
Q3 "IRLML6244TRPBF" SOT95P237X112-3N 11.242,-44.67 r180 top
Q4 "IRLML6244TRPBF" SOT95P237X112-3N 10.507,-50.358 r180 top
Q5 "IPD90P03P404ATMA1" "DPAK IPD90P03P404ATMA1" 20.574,-22.225 r0 top
Q6 "BSS138W-7-F" DIOD-SOT323-3_V 29.21,-34.417 r180 top
Q7 "IPD90P03P404ATMA1" "DPAK IPD90P03P404ATMA1" 20.574,-14.351 r0 top
Q8 "BSS138W-7-F" DIOD-SOT323-3_V 39.37,-22.098 r90 top
Q9 "BSS138W-7-F" DIOD-SOT323-3_V 32.243,-6.543 r90 top
R1 "0.002R 1206 0.5W 1%" CAPC3216X180X55ML20T25 10.922,-24.638 r180 top
R2 "10k 0402 0.1%" RESC1005X40X25ML05T10 43.688,-11.049 r180 top
R3 "0R 0402 1%" RESC1005X40X25ML05T10 15.748,-9.652 r180 top
R4 "1k 0402 1%" RESC1005X40X25ML05T10 25.146,-29.591 r0 top
R5 "0.1R 1206 0.5W 1%" CAPC3216X180X55ML20T25 11.43,-40.386 r270 top
R6 "1k 0402 1%" RESC1005X40X25ML05T10 11.176,-47.752 r270 top
R7 "1k 0402 1%" RESC1005X40X25ML05T10 37.211,-52.992 r90 top
R8 "0R 0402 1%" RESC1005X40X25ML05T10 36.068,-52.992 r90 top
R9 "10k 0402 0.1%" RESC1005X40X25ML05T10 24.765,-59.817 r270 top
R10 "1k 0402 1%" RESC1005X40X25ML05T10 82.644,-39.624 r180 top
R11 "10k 0402 0.1%" RESC1005X40X25ML05T10 82.644,-40.767 r0 top
R12 "1k 0402 1%" RESC1005X40X25ML05T10 82.677,-42.037 r180 top
R13 "1k 0402 1%" RESC1005X40X25ML05T10 24.765,-55.245 r90 top
R14 "100k 0402 0.1%" RESC1005X40X25ML05T10 24.765,-51.849 r90 top
R15 "0R 0402 1%" RESC1005X40X25ML05T10 83.185,-18.636 r270 top
R16 "100R 0402 0.1%" RESC1005X40X25ML05T10 100.076,-30.988 r180 top
R17 "100R 0402 0.1%" RESC1005X40X25ML05T10 100.076,-29.845 r180 top
R18 "100R 0402 0.1%" RESC1005X40X25ML05T10 100.076,-28.829 r180 top
R19 "10k 0402 0.1%" RESC1005X40X25ML05T10 25.146,-30.734 r180 top
R20 "1k 0402 1%" RESC1005X40X25ML05T10 13.462,-50.927 r90 top
R21 "10k 0402 0.1%" RESC1005X40X25ML05T10 9.84,-47.693 r90 top
R22 "0.082R 1206 0.5W 1%" CAPC3216X180X55ML20T25 11.938,-53.467 r180 top
R23 "10k 0402 0.1%" RESC1005X40X25ML05T10 14.605,-50.927 r270 top
R24 "0R 0402 1%" RESC1005X40X25ML05T10 24.765,-57.404 r90 top
R25 "10k 0402 0.1%" RESC1005X40X25ML05T10 67.437,-52.451 r0 top
R26 "1k 0402 1%" RESC1005X40X25ML05T10 20.287,-15.748 r180 bottom
R27 "0R 1206 0.5W 1%" CAPC3216X180X55ML20T25 12.573,-2.794 r90 bottom
R28 "0R 1206 0.5W 1%" CAPC3216X180X55ML20T25 3.683,-14.224 r180 bottom
R29 "10k 0402 0.1%" RESC1005X40X25ML05T10 30.226,-21.971 r0 top
R30 "10k 0402 0.1%" RESC1005X40X25ML05T10 29.591,-31.369 r90 top
R31 "10k 0402 0.1%" RESC1005X40X25ML05T10 66.581,-23.876 r0 top
R32 "47k 0402 0.1%" RESC1005X40X25ML05T10 47.062,-30.205 r180 top
R33 "10k 0402 0.1%" RESC1005X40X25ML05T10 47.062,-31.221 r0 top
R34 "10k 0402 0.1%" RESC1005X40X25ML05T10 61.849,-27.432 r90 top
R35 "10k 0402 0.1%" RESC1005X40X25ML05T10 49.149,-27.559 r90 top
R36 "17k4 0402 0.1%" RESC1005X40X25ML05T10 32.258,-21.971 r0 top
R37 "10k 0402 0.1%" RESC1005X40X25ML05T10 50.419,-27.559 r270 top
R38 "10k 0402 0.1%" RESC1005X40X25ML05T10 43.688,-21.209 r180 top
R39 "10k 0402 0.1%" RESC1005X40X25ML05T10 39.37,-19.685 r0 top
R40 "10k 0402 0.1%" RESC1005X40X25ML05T10 29.464,-36.576 r180 top
R41 "10k 0402 0.1%" RESC1005X40X25ML05T10 63.881,-32.893 r90 top
R42 "10k 0402 0.1%" RESC1005X40X25ML05T10 32.512,-17.272 r180 top
R43 "1k 0402 1%" RESC1005X40X25ML05T10 34.925,-6.223 r90 top
R44 "1k 0402 1%" RESC1005X40X25ML05T10 32.258,-9.017 r0 top
R45 "73k2 0402 1%" RESC1005X40X25ML05T10 60.355,-38.862 r180 top
R46 "10k 0402 0.1%" RESC1005X40X25ML05T10 60.355,-39.878 r0 top
R47 "0R 0402 1%" RESC1005X40X25ML05T10 18.509,-9.652 r0 top
R49 "1k 0402 1%" RESC1005X40X25ML05T10 39.37,-24.511 r0 top
R50 "56k 0402 0.1%" RESC1005X40X25ML05T10 65.024,-32.893 r270 top
R51 "0.1R 1206 0.5W 1%" CAPC3216X180X55ML20T25 72.898,-41.783 r0 top
R52 "0.002R 1206 0.5W 1%" CAPC3216X180X55ML20T25 11.684,-35.052 r0 top
R53 "0R 0402 1%" RESC1005X40X25ML05T10 83.185,-14.986 r270 top
R57 "10k 0402 0.1%" RESC1005X40X25ML05T10 37.465,-22.606 r270 top
R59 "10k 0402 0.1%" RESC1005X40X25ML05T10 103.635,-51.184 r180 top
R60 "130Ohm 0402 1%" RESC1005X40X25ML05T10 108.588,-55.502 r90 top
R61 "130Ohm 0402 1%" RESC1005X40X25ML05T10 107.191,-55.502 r90 top
R62 "1k 0402 1%" RESC1005X40X25ML05T10 114.935,-50.546 r180 top
R65 "130Ohm 0402 1%" RESC1005X40X25ML05T10 114.982,-49.453 r180 top
R66 "130Ohm 0402 1%" RESC1005X40X25ML05T10 115.015,-48.31 r180 top
R67 "130Ohm 0402 1%" RESC1005X40X25ML05T10 112.442,-44.908 r0 top
R68 "130Ohm 0402 1%" RESC1005X40X25ML05T10 115.065,-47.12 r180 top
R69 "130Ohm 0402 1%" RESC1005X40X25ML05T10 104.267,-53.213 r270 top
R71 "10k 0402 0.1%" RESC1005X40X25ML05T10 106.553,-44.196 r90 top
R75 "51k 0402 0.1%" RESC1005X40X25ML05T10 36.322,-58.166 r90 top
R76 "73k2 0402 1%" RESC1005X40X25ML05T10 36.322,-60.198 r90 top
R77 "2k26 0402 0.1%" RESC1005X40X25ML05T10 51.435,-57.752 r270 top
R78 "0R 0402 1%" RESC1005X40X25ML05T10 65.405,-52.959 r0 top
R79 "0R 0402 1%" RESC1005X40X25ML05T10 65.372,-54.356 r180 top
R80 "100k 0402 0.1%" RESC1005X40X25ML05T10 46.101,-60.198 r270 top
R81 "100k 0402 0.1%" RESC1005X40X25ML05T10 58.42,-54.737 r0 top
R83 "10k 0402 0.1%" RESC1005X40X25ML05T10 47.371,-60.198 r90 top
R84 "10k 0402 0.1%" RESC1005X40X25ML05T10 27.813,-37.211 r90 top
R86 "100k 0402 0.1%" RESC1005X40X25ML05T10 28.956,-12.86 r90 top
R87 "10k 0402 0.1%" RESC1005X40X25ML05T10 28.956,-14.859 r90 top
R88 "100R 0402 0.1%" RESC1005X40X25ML05T10 41.656,-15.24 r180 top
R89 "0.005R 1206 0.5W 0.5% 100ppm" CAPC3216X180X55ML20T25 3.556,-14.224 r0 top
R90 "100R 0402 0.1%" RESC1005X40X25ML05T10 41.656,-14.224 r180 top
R91 "10k 0402 0.1%" RESC1005X40X25ML05T10 29.591,-16.891 r180 top
R92 "17k4 0402 0.1%" RESC1005X40X25ML05T10 30.226,-26.543 r0 top
R93 "127k 0402 0.1%" RESC1005X40X25ML05T10 30.226,-24.003 r180 top
R94 "100k 0402 0.1%" RESC1005X40X25ML05T10 30.226,-22.987 r0 top
R95 "100R 0402 0.1%" RESC1005X40X25ML05T10 30.226,-25.019 r0 top
RF_PCB1 "Planar Inverted-F Antenna" PCB-k9titb4465gfk1ijwrnj-1 75.072,-12.724 r180 bottom
SW2 "XKB7070-Z" SW-TH_6P-L7.0-W7.0-P2.00 17.947,-4.032 r0 bottom
U1 "ESP32-S3-WROOM-1-N8" ESP32S3WROOM1N8R2 54.851,-12.499 r0 top
U2 "Simcom SIM800C" SIM800C 82.057,-37.362 r90 top
U3 "eSIM MFF2" SON127P600X95_HS-9N 103.251,-36.83 r0 top
U4 "INA3221AIRGVR" RGV0016A_V 37.338,-39.205 r180 top
U5 "LTV-356T" LTST-LTV-356T-4_V 29.591,-52.197 r180 top
U6 "TPS563231DRLR" FP-DRL0006A-MFG 67.496,-31.566 r180 top
U7 "LTV-356T" LTST-LTV-356T-4_V 29.591,-58.039 r180 top
U9 "INA3221AIRGVR" RGV0016A_V 30.353,-46.101 r90 top
U10 "TPS563231DRLR" FP-DRL0006A-MFG 49.438,-32.469 r90 top
U11 "TPS563231DRLR" FP-DRL0006A-MFG 62.73,-41.126 r90 top
U12 "TYPE-C 16PLC-H10.0" TYPE-C-TH_16PLC-H10.0 75.627,-55.557 r90 top
U13 "TYPE-C 16PLC-H10.0" TYPE-C-TH_16PLC-H10.0 81.977,-55.557 r90 bottom
U14 "WS2812B-B/T" ADA-RGB-1655_V 17.78,-19.304 r0 bottom
U16 "SPX3819M5-L-3-3/TR" SOT-23-5_L3.0-W1.7-P0.95-LS2.8-BR 99.06,-52.197 r180 top
U17 "AFE4490RHAR" RHA0040B_V 109.173,-49.58 r180 top
U19 "LM2903BIDR" FP-D0008A-MFG 41.783,-58.166 r0 top
U20 "SN74LVC1G3157DCKR" FP-DCK0006A-IPC_B 54.298,-58.166 r180 top
U21 "BQ34110PWR" FP-PW0014A-MFG 34.671,-13.716 r0 top
U22 "SPX3819M5-L-3-3/TR" SOT-23-5_L3.0-W1.7-P0.95-LS2.8-BR 35.306,-19.05 r270 top
U23 "BQ25792RQMR" FP-RQM0029A-MFG 33.909,-26.035 r180 top
Y1 "ABM3-8.000MHZ-D2Y-T" FP-ABM3-MFG 110.109,-58.674 r180 top

## Footprints (in the part's own frame and the unit in brackets; to place one, negate y for a bottom-side part, rotate by r counter-clockwise, add the part's x,y. Pads: shape width x height; smd on the part's side, far side on the other; paste and mask are expansions set on the pad)
62201021121 [mm] "Pin Header, pitch 1.27 mm, THT, Vertical, dual row, 10p"
  rrect50% 0.95x0.95 hole 0.65: 1(-2.54,-0.635)
  round 0.95 hole 0.65: 2(-2.54,0.635) 3(-1.27,-0.635) 4(-1.27,0.635) 5(0,-0.635) 6(0,0.635) 7(1.27,-0.635) 8(1.27,0.635) 9(2.54,-0.635) 10(2.54,0.635)
  silkscreen extent -3.93,-1.78 3.32,1.78, body extent -3.17,-1.7 3.18,1.7, height 5.33
ADA-RGB-1655_V [mm] "SMD, 4-Leads, Body 5x5mm"
  rect 1.5x0.9 smd: 1(-2.45,1.65) 2(-2.45,-1.65) 3(2.45,-1.65) 4(2.45,1.65)
  silkscreen extent -3.87,-2.5 2.5,2.5, body extent -2.7,-2.5 2.7,2.5, height 1.68
BUZZER-12MM-NS [mil] "BUZZER-12MM-NS"
  round 54 hole 36: 1(128,0) 2(-127.95,0)
  body extent -233,-233 233,233, height 335
CAPC1005X55X25NL5T10 [mm] "Chip Capacitor, 2-Leads, Body 1.05x0.55mm, IPC Medium Density"
  rect 0.66x0.62 smd: 1(-0.44,0) 2(0.44,0)
  body extent -0.53,-0.28 0.53,0.28, height 0.55
CAPC3216X180X55ML20T25 [mm] "CAPC3216X180X55ML20T25"
  rect 1.55x1.9 smd: 1(-1.475,0) 2(1.475,0)
  silkscreen extent -0.3,-0.85 0.3,0.85, body extent -1.7,-0.9 1.7,0.9, height 1.8
CONN-TH_4P-P5.08_KF2EDGVC-5.08-4P [mm]
  round 2.8 hole 1.8: 1(-7.62,0) 2(-2.54,0) 3(2.54,0) 4(7.62,0)
  silkscreen extent -10.64,-4.55 10.64,3.85
DIOD-SOT323-3_V [mm] "SOT323, 3-Leads, Body 2.2x1.35mm, Pitch 0.65mm"
  rect 0.9x0.7 smd: 1(-0.95,0.65) 2(-0.95,-0.65) 3(0.95,0)
  silkscreen extent -1.08,-1.1 0.67,1.67, body extent -1.1,-1.1 1.1,1.1, height 1.07
DIOM5436X244N [mm]
  rect 2.2x2.15 smd: 1(-2.2,0) 2(2.2,0)
  silkscreen extent -3.27,-1.81 2.7,1.81, body extent -2.7,-1.81 2.7,1.81, height 2.44
"DPAK IPD90P03P404ATMA1" [mm]
  rect 3.6x2 smd: 1(-4.4,2.29) 3(-4.4,-2.29)
  rect 6.2x5.8 smd: 2(2.8,0)
  silkscreen extent -4.52,-3.27 -0.45,3.76, body extent -4.57,-3.27 5.37,3.27, height 2.29
ESP32S3WROOM1N8R2 [mm]
  rect 1.5x0.9 smd: 1(-8.75,5.26) 2(-8.75,3.99) 3(-8.75,2.72) 4(-8.75,1.45) 5(-8.75,0.18) 6(-8.75,-1.09) 7(-8.75,-2.36) 8(-8.75,-3.63) 9(-8.75,-4.9) 10(-8.75,-6.17) 11(-8.75,-7.44) 12(-8.75,-8.71) 13(-8.75,-9.98) 14(-8.75,-11.25) 27(8.75,-11.25) 28(8.75,-9.98) 29(8.75,-8.71) 30(8.75,-7.44) 31(8.75,-6.17) 32(8.75,-4.9) 33(8.75,-3.63) 34(8.75,-2.36) 35(8.75,-1.09) 36(8.75,0.18) 37(8.75,1.45) 38(8.75,2.72) 39(8.75,3.99) 40(8.75,5.26)
  rect 0.9x1.5 smd: 15(-6.985,-12.5) 16(-5.715,-12.5) 17(-4.445,-12.5) 18(-3.175,-12.5) 19(-1.905,-12.5) 20(-0.635,-12.5) 21(0.635,-12.5) 22(1.905,-12.5) 23(3.175,-12.5) 24(4.445,-12.5) 25(5.715,-12.5) 26(6.985,-12.5)
  rect 0.9x0.9 smd: 41(-1.5,-2.46) 42(-1.5,-1.06) 43(-2.9,-1.06) 44(-2.9,-2.46) 45(-2.9,-3.86) 46(-1.5,-3.86) 47(-0.1,-3.86) 48(-0.1,-2.46) 49(-0.1,-1.06)
  silkscreen extent -10.1,5.35 9,12.75, body extent -9,-12.75 9,12.75, height 2.7
FP-2-5747706-0-MFG [mil]
  rect 62.65x62.65 hole 41 paste-39370.1 mask+0: 1(216,56)
  round 62.65 hole 41 paste-39370.1 mask+0: 2(108,56) 3(0,56) 4(-108,56) 5(-216,56) 6(162,-56) 7(54,-56) 8(-54,-56) 9(-162,-56)
  round 183.99 hole 121 paste-39370.1 mask+0: 10(-492,0) 11(492,0)
  silkscreen extent -614,-255 614,284, body extent -606,-248 606,248, height 494
FP-6_541-5094_01-4-MFG [mm]
  rect 0.8x0.8 smd paste+0 mask+0: 1(-0.75,0) 2(0.75,0)
  silkscreen extent -1.83,-0.82 0.9,0.82, body extent -0.8,-0.4 0.8,0.4, height 1
FP-340BQ-MFG [mm]
  rect 1.15x1.45 smd paste+0 mask+0: 1(2.75,0.985) 2(2.75,-0.985)
  rect 4.65x4.15 smd paste+0 mask+0: 3(-1,0)
  silkscreen extent -4.02,-2.31 3.08,2.31, body extent -3.25,-2.21 3.25,2.21, height 1.2
FP-ABM3-MFG [mm]
  rect 1.9x2.4 smd paste+0 mask+0: 1(-2.05,0) 2(2.05,0)
  silkscreen extent -2.6,-1.7 2.6,1.7, body extent -3.1,-1.8 3.1,1.8, height 0.25
FP-B4B-XH-A_LF_SN-MFG [mm]
  rect 1.4x1.4 hole 0.9 paste-1000 mask+0: 1(3.75,-0.525)
  round 1.4 hole 0.9 paste-1000 mask+0: 2(1.25,-0.525) 3(-1.25,-0.525) 4(-3.75,-0.525)
  silkscreen extent -6.2,-2.88 6.87,2.88, body extent -6.3,-2.98 6.3,2.98, height 0.25
FP-D0008A-MFG [mm]
  rrect17% 1.55x0.6 smd paste+0 mask+0: 1(-2.7,1.905) 2(-2.7,0.635) 3(-2.7,-0.635) 4(-2.7,-1.905) 5(2.7,-1.905) 6(2.7,-0.635) 7(2.7,0.635) 8(2.7,1.905)
  silkscreen extent -4.17,-2.5 1.5,2.5, body extent -3.57,-2.75 3.57,2.75, height 0.25
FP-DCK0006A-IPC_B [mm]
  rect 1.464x0.376 smd paste+0 mask+0: 1(-0.82,0.65)
  rrect100% 1.464x0.376 smd paste+0 mask+0: 2(-0.82,0) 3(-0.82,-0.65) 4(0.82,-0.65) 5(0.82,0) 6(0.82,0.65)
  silkscreen extent -2.25,-1.25 1.05,1.25
FP-DEM8045C-MFG [mm]
  rect 1.75x3 smd paste+0 mask+0: 1(-3.375,0) 2(3.375,0)
  silkscreen extent -4.95,-4.15 4.15,4.15, body extent -4.35,-4.25 4.35,4.25, height 0.25
FP-DFE201612C-IPC_A [mm]
  rect 1.554x1.906 smd paste+0 mask+0: 1(-0.876,0) 2(0.876,0)
  silkscreen extent -1.65,-1.35 1.65,1.35, body extent -2.15,-1.45 2.15,1.45, height 0.25
FP-DRL0006A-MFG [mm]
  rrect33% 0.67x0.3 smd paste+0 mask+0: 1(-0.74,0.5) 2(-0.74,0) 3(-0.74,-0.5) 4(0.74,-0.5) 5(0.74,0) 6(0.74,0.5)
  silkscreen extent -1.9,-1.05 0.65,1.05, body extent -1.17,-1.1 1.17,1.1, height 0.25
FP-GRM188-0_2-IPC_B [mm]
  rect 1.105x1.006 smd paste+0 mask+0: 1(-0.701,0) 2(0.701,0)
  silkscreen extent -1.25,-0.9 1.25,0.9, body extent -1.5,-0.75 1.5,0.75, height 0.25
FP-PG-TO252-3-MFG [mm]
  rect 1.5x2.5 smd paste+0 mask+0: 1(-2.3,-4.575) 3(2.3,-4.575)
  rect 7x7 smd paste+0 mask+0: 4(0,2.325)
  silkscreen extent -3.36,-2.28 3.36,-1.55, body extent -3.6,-5.92 3.6,5.92, height 0.25
FP-PW0014A-MFG [mm]
  rect 1.6x0.35 smd paste-1000 mask+0: 1(-2.8,1.95) 2(-2.8,1.3) 3(-2.8,0.65) 4(-2.8,0) 5(-2.8,-0.65) 6(-2.8,-1.3) 7(-2.8,-1.95) 8(2.8,-1.95) 9(2.8,-1.3) 10(2.8,-0.65) 11(2.8,0) 12(2.8,0.65) 13(2.8,1.3) 14(2.8,1.95)
  silkscreen extent -4.32,-2.55 2.25,2.55, body extent -3.7,-2.8 3.7,2.8, height 0.25
FP-RQM0029A-MFG [mm]
  round 0.192 smd paste+0 mask+0: 1(-1.369,1.631)
  rrect50% 0.6x0.2 smd paste+0 mask+0: 2(-1.9,1.2) 3(-1.9,0.8) 4(-1.9,0.4) 5(-1.9,0) 6(-1.9,-0.4) 7(-1.9,-0.8) 8(-1.9,-1.2) 20(1.9,0) 21(1.9,0.4) 22(1.9,0.8) 23(1.9,1.2)
  round 0.158 smd paste+0 mask+0: 9(-1.412,-1.763)
  rrect50% 0.2x0.6 smd paste+0 mask+0: 10(-1,-1.9) 11(-0.6,-1.9) 12(-0.2,-1.9) 13(0.2,-1.9) 14(0.6,-1.9) 15(1,-1.9)
  round 0.175 smd paste+0 mask+0: 16(1.431,-1.631) 24(1.381,1.631)
  rrect50% 0.7x0.2 smd paste+0 mask+0: 17(1.85,-1.2)
  rrect50% 0.65x0.2 smd paste+0 mask+0: 18(1.875,-0.8)
  rrect50% 0.68x0.2 smd paste+0 mask+0: 19(1.86,-0.4)
  rrect50% 0.2x1 smd paste+0 mask+0: 25(0.9,1.7) 26(0.45,1.7) 27(0,1.7) 28(-0.45,1.7)
  rrect50% 0.2x0.95 smd paste+0 mask+0: 29(-0.9,1.725)
  Top Layer region: 2.2,1.65 2.196,1.669 2.185,1.685 2.169,1.696 2.15,1.7 2.15,1.7 1.45,1.7 1.45,2.15 1.446,2.169 1.435,2.185 1.419,2.196 1.4,2.2 1.4,2.2 1.3,2.2 1.275,2.193 1.257,2.175 1.25,2.15 1.25,2.15 1.25,1.55 1.254,1.531 1.265,1.515 1.281,1.504 1.3,1.5 1.3,1.5 2.15,1.5 2.169,1.504 2.185,1.515 2.196,1.531 2.2,1.55 2.2,1.55
  Top Layer region: 2.2,-1.65 2.193,-1.675 2.175,-1.693 2.15,-1.7 2.15,-1.7 1.5,-1.7 1.5,-2.15 1.496,-2.169 1.485,-2.185 1.469,-2.196 1.45,-2.2 1.45,-2.2 1.35,-2.2 1.325,-2.193 1.307,-2.175 1.3,-2.15 1.3,-2.15 1.3,-1.55 1.304,-1.531 1.315,-1.515 1.331,-1.504 1.35,-1.5 1.35,-1.5 2.15,-1.5 2.169,-1.504 2.185,-1.515 2.196,-1.531 2.2,-1.55 2.2,-1.55
  Top Layer region: -2.2,-1.65 -2.193,-1.675 -2.175,-1.693 -2.15,-1.7 -2.15,-1.7 -1.5,-1.7 -1.5,-2.15 -1.496,-2.169 -1.485,-2.185 -1.469,-2.196 -1.45,-2.2 -1.45,-2.2 -1.35,-2.2 -1.331,-2.196 -1.315,-2.185 -1.304,-2.169 -1.3,-2.15 -1.3,-2.15 -1.3,-1.55 -1.304,-1.531 -1.315,-1.515 -1.331,-1.504 -1.35,-1.5 -1.35,-1.5 -2.15,-1.5 -2.169,-1.504 -2.185,-1.515 -2.196,-1.531 -2.2,-1.55 -2.2,-1.55
  Top Layer region: -2.2,1.65 -2.193,1.675 -2.175,1.693 -2.15,1.7 -2.15,1.7 -1.45,1.7 -1.45,2.15 -1.443,2.175 -1.425,2.193 -1.4,2.2 -1.4,2.2 -1.3,2.2 -1.275,2.193 -1.257,2.175 -1.25,2.15 -1.25,2.15 -1.25,1.55 -1.254,1.531 -1.265,1.515 -1.281,1.504 -1.3,1.5 -1.3,1.5 -2.15,1.5 -2.169,1.504 -2.185,1.515 -2.196,1.531 -2.2,1.55 -2.2,1.55
  silkscreen extent -2.88,-2.3 2.3,2.3, body extent -2.3,-2.3 2.3,2.3, height 0.25
FP-SOD323-MFG [mm]
  rect 0.59x0.45 smd paste+0 mask+0: 1(-1.055,0) 2(1.055,0)
  silkscreen extent -2.02,-0.7 0.9,0.7, body extent -1.45,-0.8 1.45,0.8, height 0.25
LESD5D50CT1G [mm]
  rect 0.48x0.4 smd: 1(-0.66,0) 2(0.66,0)
  silkscreen extent -1.15,-0.4 0.6,0.4, body extent -0.8,-0.4 0.8,0.4, height 0.6
LTST-LTV-356T-4_V [mm] "SMD, 4-Leads, Body 4.6x4.15mm, Pitch 2.54mm"
  rect 1x0.8 smd: 1(-3.25,1.27) 2(-3.25,-1.27) 3(3.25,-1.27) 4(3.25,1.27)
  silkscreen extent -4.43,-2.07 2.3,2.07, body extent -2.3,-2.07 2.3,2.07, height 2.32
MF06A_N [mm]
  rect 1.1x0.65 smd: 1(-1.2,0.95) 2(-1.2,0) 3(-1.2,-0.95) 4(1.2,-0.95) 5(1.2,0) 6(1.2,0.95)
  silkscreen extent -1.32,-1.5 0.25,1.95, body extent -0.83,-1.49 0.83,1.5, height 1.22
NXP-SOT23-3_V [mm] "SOT23, 3-Leads, Body 1.3x2.9mm, Pitch 0.95mm"
  rect 0.6x0.7 smd paste-0.05: 1(0.95,1) 2(-0.95,1) 3(0,-1)
  silkscreen extent -1.45,-0.65 1.45,1.79, body extent -1.45,-0.65 1.45,0.65, height 1.1
ONSC-SOD-123-2-425-04_V [mm] "SOD, 2-Leads, Body 2.69x1.6mm"
  rect 0.91x1.22 smd: 1(-1.635,0) 2(1.635,0)
  silkscreen extent -1.76,-0.8 0.78,1.28, body extent -1.35,-0.8 1.35,0.8, height 1.35
ONSC-SOD-923-2-514AB-01_V [mm] "SOD, 2-Leads, Body 0.8x0.6mm"
  rect 0.36x0.25 smd: 1(-0.42,0) 2(0.42,0)
  silkscreen extent -0.47,0.48 -0.37,0.57, body extent -0.4,-0.3 0.4,0.3, height 0.4
PCB-37z8hw1ej4f71bosen9e-1 [mm] "Low Profile Socket Strip, 2x3 Pins, Vertical, 2.54mm Pitch, Female"
  rect 1.4x1.4 hole 0.762: 1(0,0)
  round 1.4 hole 0.762: 2(2.54,0) 3(0,-2.54) 4(2.54,-2.54) 5(0,-5.08) 6(2.54,-5.08)
  silkscreen extent -1.27,-6.48 3.81,1.4, body extent -1.21,-6.35 3.75,1.27, height 4.57
PCB-h4cyb3wxd4gf7j132tzl-1 [mm]
  rect 2.5x2.5 hole 1.8: 1(-2.54,0)
  round 2.032 hole 1.27: 2(2.54,0)
  silkscreen extent -6.1,-4.45 5.97,4.19, body extent -5.78,-11.94 5.78,3.67, height 21.08
PCB-k9titb4465gfk1ijwrnj-1 [mil]
  round 20 smd mask+4: 1(-315,35) 2(-35,35)
  Top Layer region: -2220.87,164.33 -2283.46,164.33 -2283.46,471.42 -2220.87,471.42
  Top Layer region: -35.65,157.48 -1318.92,157.48 -1318.92,275.59 -35.65,275.59
  Top Layer region: -275.59,0 -354.33,0 -354.33,472.44 -275.59,472.44
  Top Layer region: 0,393.7 -2283.46,393.7 -2283.46,472.44 0,472.44
  Top Layer region: 0,0 -78.74,0 -78.74,472.44 0,472.44
PCB-pp1at3pfx7vls1ur72ey-1 [mil]
  rrect20% 60x60 hole 40: 1(0,0)
  round 60 hole 40: 2(100,0)
  silkscreen extent -96,-134 196,93, body extent -92,-132 192,98, height 284
PCB-wbedblczgi94a8su0lrn-1 [mm]
  oval 1.524x1.575 hole 1: 1(-3.5,1.355) 2(-1,1.355) 3(1,1.355) 4(3.5,1.355)
  round 3 hole 2.38: 5(-6.57,-1.355) 6(6.57,-1.355)
  silkscreen extent -7.5,-3.76 7.5,4.64, body extent -7.9,-3.56 7.9,3.56, height 15.01
PJ-3059-B [mm]
  rect 2x1.3 hole 0.8 square: 2(-0.9,-2.25) 3(-0.9,2.25)
  rect 1.3x2 hole 0.8 square: 4(-2.3,0)
  round 0 / inner round 1.2 / far side round 0 hole 1.2: ""(2.4,0)
  silkscreen extent -3,-4 3,4
RESC1005X40X25ML05T10 [mm] "Chip Resistor, 2-Leads, Body 1.00x0.50mm, IPC Low Density"
  rect 0.7x0.65 smd: 1(-0.475,0) 2(0.475,0)
  body extent -0.53,-0.27 0.53,0.28, height 0.4
RGV0016A_V [mm] "QFN, 16-Leads, Body 4x4mm, Pitch 0.65mm, Thermal Pad 2.16x2.16mm, TI Recommended"
  rrect33% 0.75x0.3 smd: 1(-1.825,0.975) 2(-1.825,0.325) 3(-1.825,-0.325) 4(-1.825,-0.975) 9(1.825,-0.975) 10(1.825,-0.325) 11(1.825,0.325) 12(1.825,0.975)
  rrect33% 0.3x0.75 smd: 5(-0.975,-1.825) 6(-0.325,-1.825) 7(0.325,-1.825) 8(0.975,-1.825) 13(0.975,1.825) 14(0.325,1.825) 15(-0.325,1.825) 16(-0.975,1.825)
  rrect11% 0.939x0.939 on Top Paste: 17(-0.57,0.57) 17(-0.57,-0.57) 17(0.57,0.57) 17(0.57,-0.57)
  rrect5% 2.1x2.1 smd paste-1.08: 17(0,0)
  silkscreen extent -2.22,-2.22 2.22,2.22, body extent -2.07,-2.07 2.07,2.07, height 1.01
RHA0040B_V [mm] "QFN, 40-Leads, Body 6x6mm, Pitch 0.5mm, Thermal Pad 4.15 x 4.15mm, TI Recommended"
  rrect43% 0.6x0.23 smd mask+0.07: 1(-2.9,2.25) 2(-2.9,1.75) 3(-2.9,1.25) 4(-2.9,0.75) 5(-2.9,0.25) 6(-2.9,-0.25) 7(-2.9,-0.75) 8(-2.9,-1.25) 9(-2.9,-1.75) 10(-2.9,-2.25) 21(2.9,-2.25) 22(2.9,-1.75) 23(2.9,-1.25) 24(2.9,-0.75) 25(2.9,-0.25) 26(2.9,0.25) 27(2.9,0.75) 28(2.9,1.25) 29(2.9,1.75) 30(2.9,2.25)
  rrect43% 0.23x0.6 smd mask+0.07: 11(-2.25,-2.9) 12(-1.75,-2.9) 13(-1.25,-2.9) 14(-0.75,-2.9) 15(-0.25,-2.9) 16(0.25,-2.9) 17(0.75,-2.9) 18(1.25,-2.9) 19(1.75,-2.9) 20(2.25,-2.9) 31(2.25,2.9) 32(1.75,2.9) 33(1.25,2.9) 34(0.75,2.9) 35(0.25,2.9) 36(-0.25,2.9) 37(-0.75,2.9) 38(-1.25,2.9) 39(-1.75,2.9) 40(-2.25,2.9)
  rrect2% 4.15x4.15 smd paste-2.1: 41(0,0)
  silkscreen extent -3.22,-3.22 3.22,3.22, body extent -3.08,-3.08 3.08,3.08, height 1.01
SHDR2W85P0X381_1X2_850X700X935P [mm]
  rect 2.1x2.1 hole 1.4: 1(0,0)
  round 2.1 hole 1.4: 2(3.81,0)
  silkscreen extent -2.34,-3.05 6.46,4.15, body extent -2.34,-3.5 6.15,3.5, height 9.35
SIM800C [mm]
  oval 1.8x0.6 smd: 1(0,0) 2(0,-1.1) 3(0,-2.2) 4(0,-3.3) 5(0,-4.4) 6(0,-5.5) 7(0,-6.6) 8(0,-7.7) 9(0,-8.8) 10(0,-9.9) 11(0,-11) 12(0,-12.1) 22(15.7,-12.1) 23(15.7,-11) 24(15.7,-9.9) 25(15.7,-8.8) 26(15.7,-7.7) 27(15.7,-6.6) 28(15.7,-5.5) 29(15.7,-4.4) 30(15.7,-3.3) 31(15.7,-2.2) 32(15.7,-1.1) 33(15.7,0)
  oval 0.6x1.8 smd: 13(3.45,-14.85) 14(4.55,-14.85) 15(5.65,-14.85) 16(6.75,-14.85) 17(7.85,-14.85) 18(8.95,-14.85) 19(10.05,-14.85) 20(11.15,-14.85) 21(12.25,-14.85) 34(12.25,2.75) 35(11.15,2.75) 36(10.05,2.75) 37(8.95,2.75) 38(7.85,2.75) 39(6.75,2.75) 40(5.65,2.75) 41(4.55,2.75) 42(3.45,2.75)
  Keep-Out Layer pour cut-out: 12.5,1.38 14.65,1.38 14.65,-3.57 12.5,-3.57
  silkscreen extent -1.45,-15.25 16.2,3.25, body extent 0,-14.85 15.7,2.75, height 2.3
SON127P600X95_HS-9N [mm]
  rect 1.976x0.5 smd: 1(-3.183,1.905) 2(-3.183,0.635) 3(-3.183,-0.635) 4(-3.183,-1.905) 5(3.183,-1.905) 6(3.183,-0.635) 7(3.183,0.635) 8(3.183,1.905)
  rect 2.77x3.9 smd paste-1.385: 9(0,0)
  silkscreen extent -3.67,-2.73 3.22,2.77, body extent -3.08,-2.58 3.08,2.58, height 0.95
SOT65P210X110-3N [mm]
  rect 1x0.5 smd: 1(-1,0.65) 2(-1,-0.65) 3(1,0)
  silkscreen extent -1.5,-1 0.15,1.15, body extent -1.1,-1.1 1.1,1.1, height 1.1
SOT95P237X112-3N [mm]
  rect 1.3x0.6 smd: 1(-1.05,0.95) 2(-1.05,-0.95) 3(1.05,0)
  silkscreen extent -1.7,-1.46 0.05,1.5, body extent -1.18,-1.46 1.18,1.46, height 1.12
SOT-23-5_L3.0-W1.7-P0.95-LS2.8-BR [mm]
  rect 1x0.6 smd: 1(1.3,-0.95) 2(1.3,0) 3(1.3,0.95) 4(-1.3,0.95) 5(-1.3,-0.95)
  silkscreen extent -0.9,-1.78 1.65,1.55
SW-TH_6P-L7.0-W7.0-P2.00 [mm]
  rect 1.6x1.6 hole 1: 1(2.5,2)
  round 1.6 hole 1: 2(2.5,0) 3(2.5,-2) 4(-2.5,2) 5(-2.5,0) 6(-2.5,-2)
  silkscreen extent -3.6,-3.6 4.06,4.06
TYPE-C-TH_16PLC-H10.0 [mm]
  rect 0.62x0.62 hole 0.42: A1(-3.25,0.7) A4(-2.3,0.7) A5(-1.35,0.7) A6(-0.45,0.7) A7(0.45,0.7) A8(1.35,0.7) A9(2.3,0.7) A12(3.25,0.7) B1(3.25,-0.7) B4(2.3,-0.7) B5(1.35,-0.7) B6(0.45,-0.7) B7(-0.45,-0.7) B8(-1.35,-0.7) B9(-2.3,-0.7) B12(-3.25,-0.7)
  oval 2x0.9 hole 0.5 slot 1.45 at 0 deg: A2(-2,1.93) A10(2,1.93) B2(2,-1.93) B10(-2,-1.93)
  silkscreen extent -4.75,-1.9 4.75,1.9